# Altium PCB Flight_Computer_2_GE.PcbDoc (part 1 of 5)
Units mil, origin at the board's own origin, x right, y up, seen from the top; angles counter-clockwise.
Board outline 4000 x 3000 mil, 4 copper layers (Top Layer, GND, 3.3V, Bottom Layer), stack 62.449 mil thick; 220 components, 150 nets, 776 pads, 444 vias.
Unrouted connection lines stored in the file: 107.
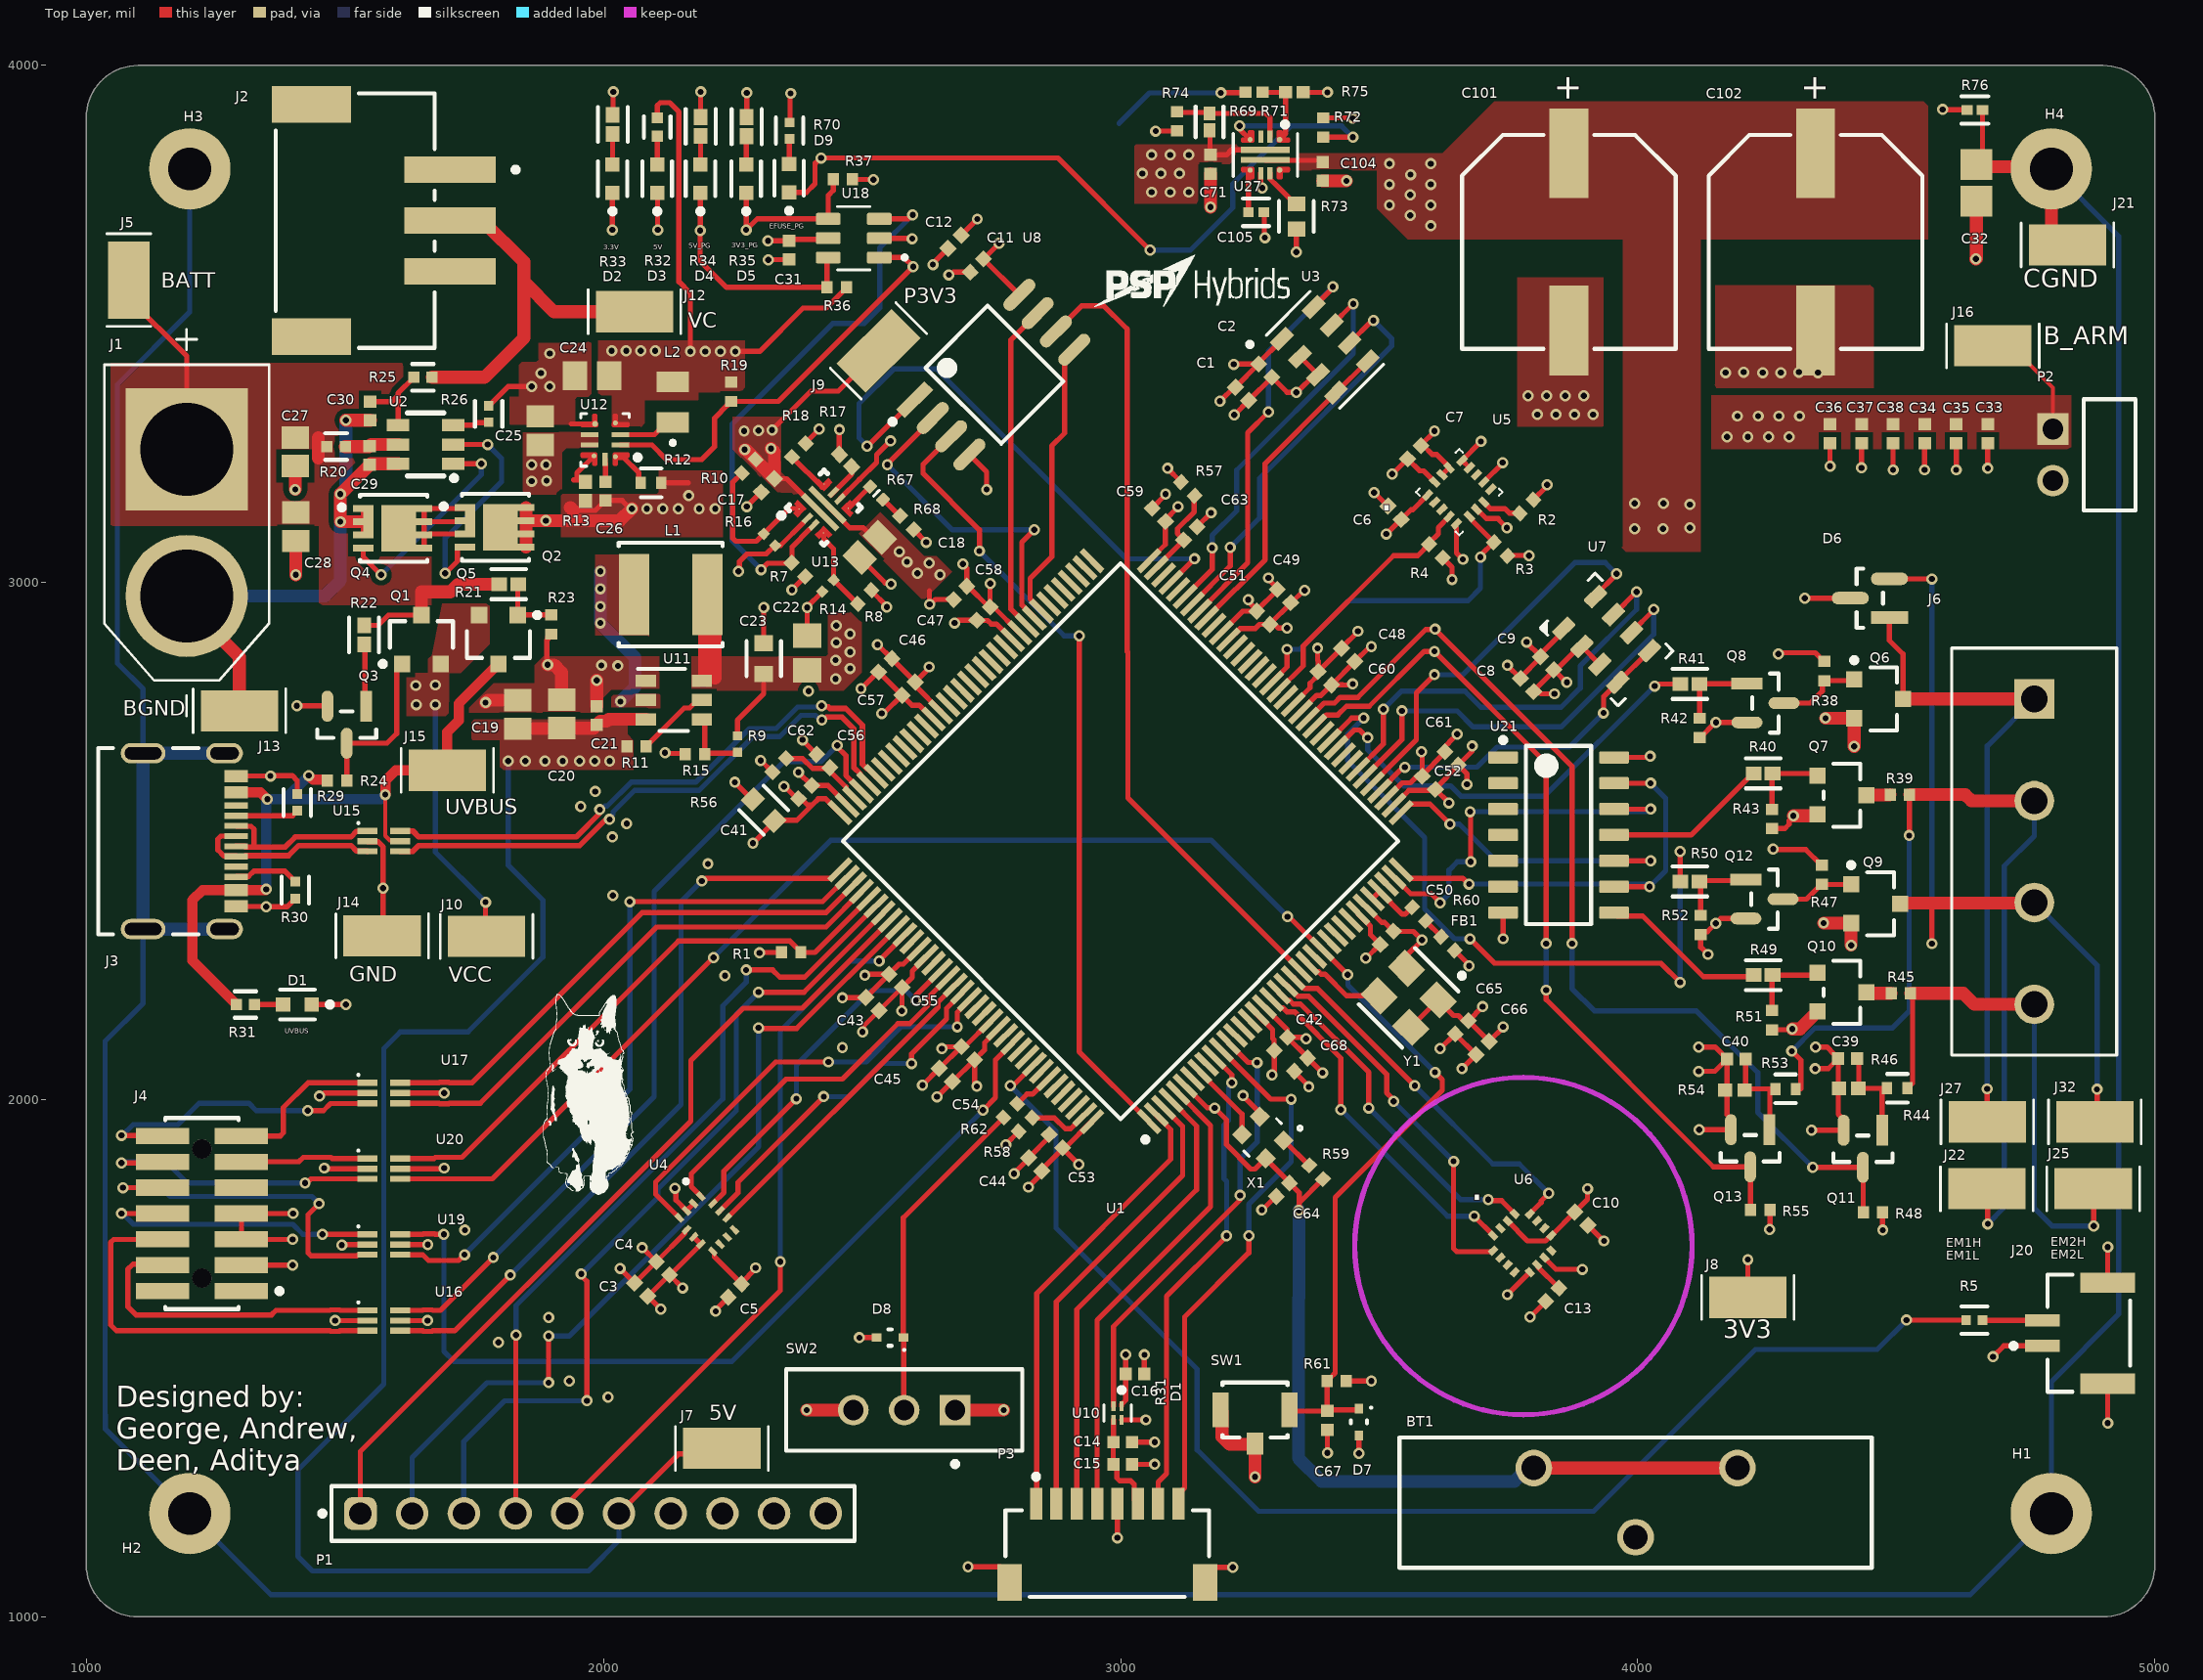
[diagram p0: Top Layer view]
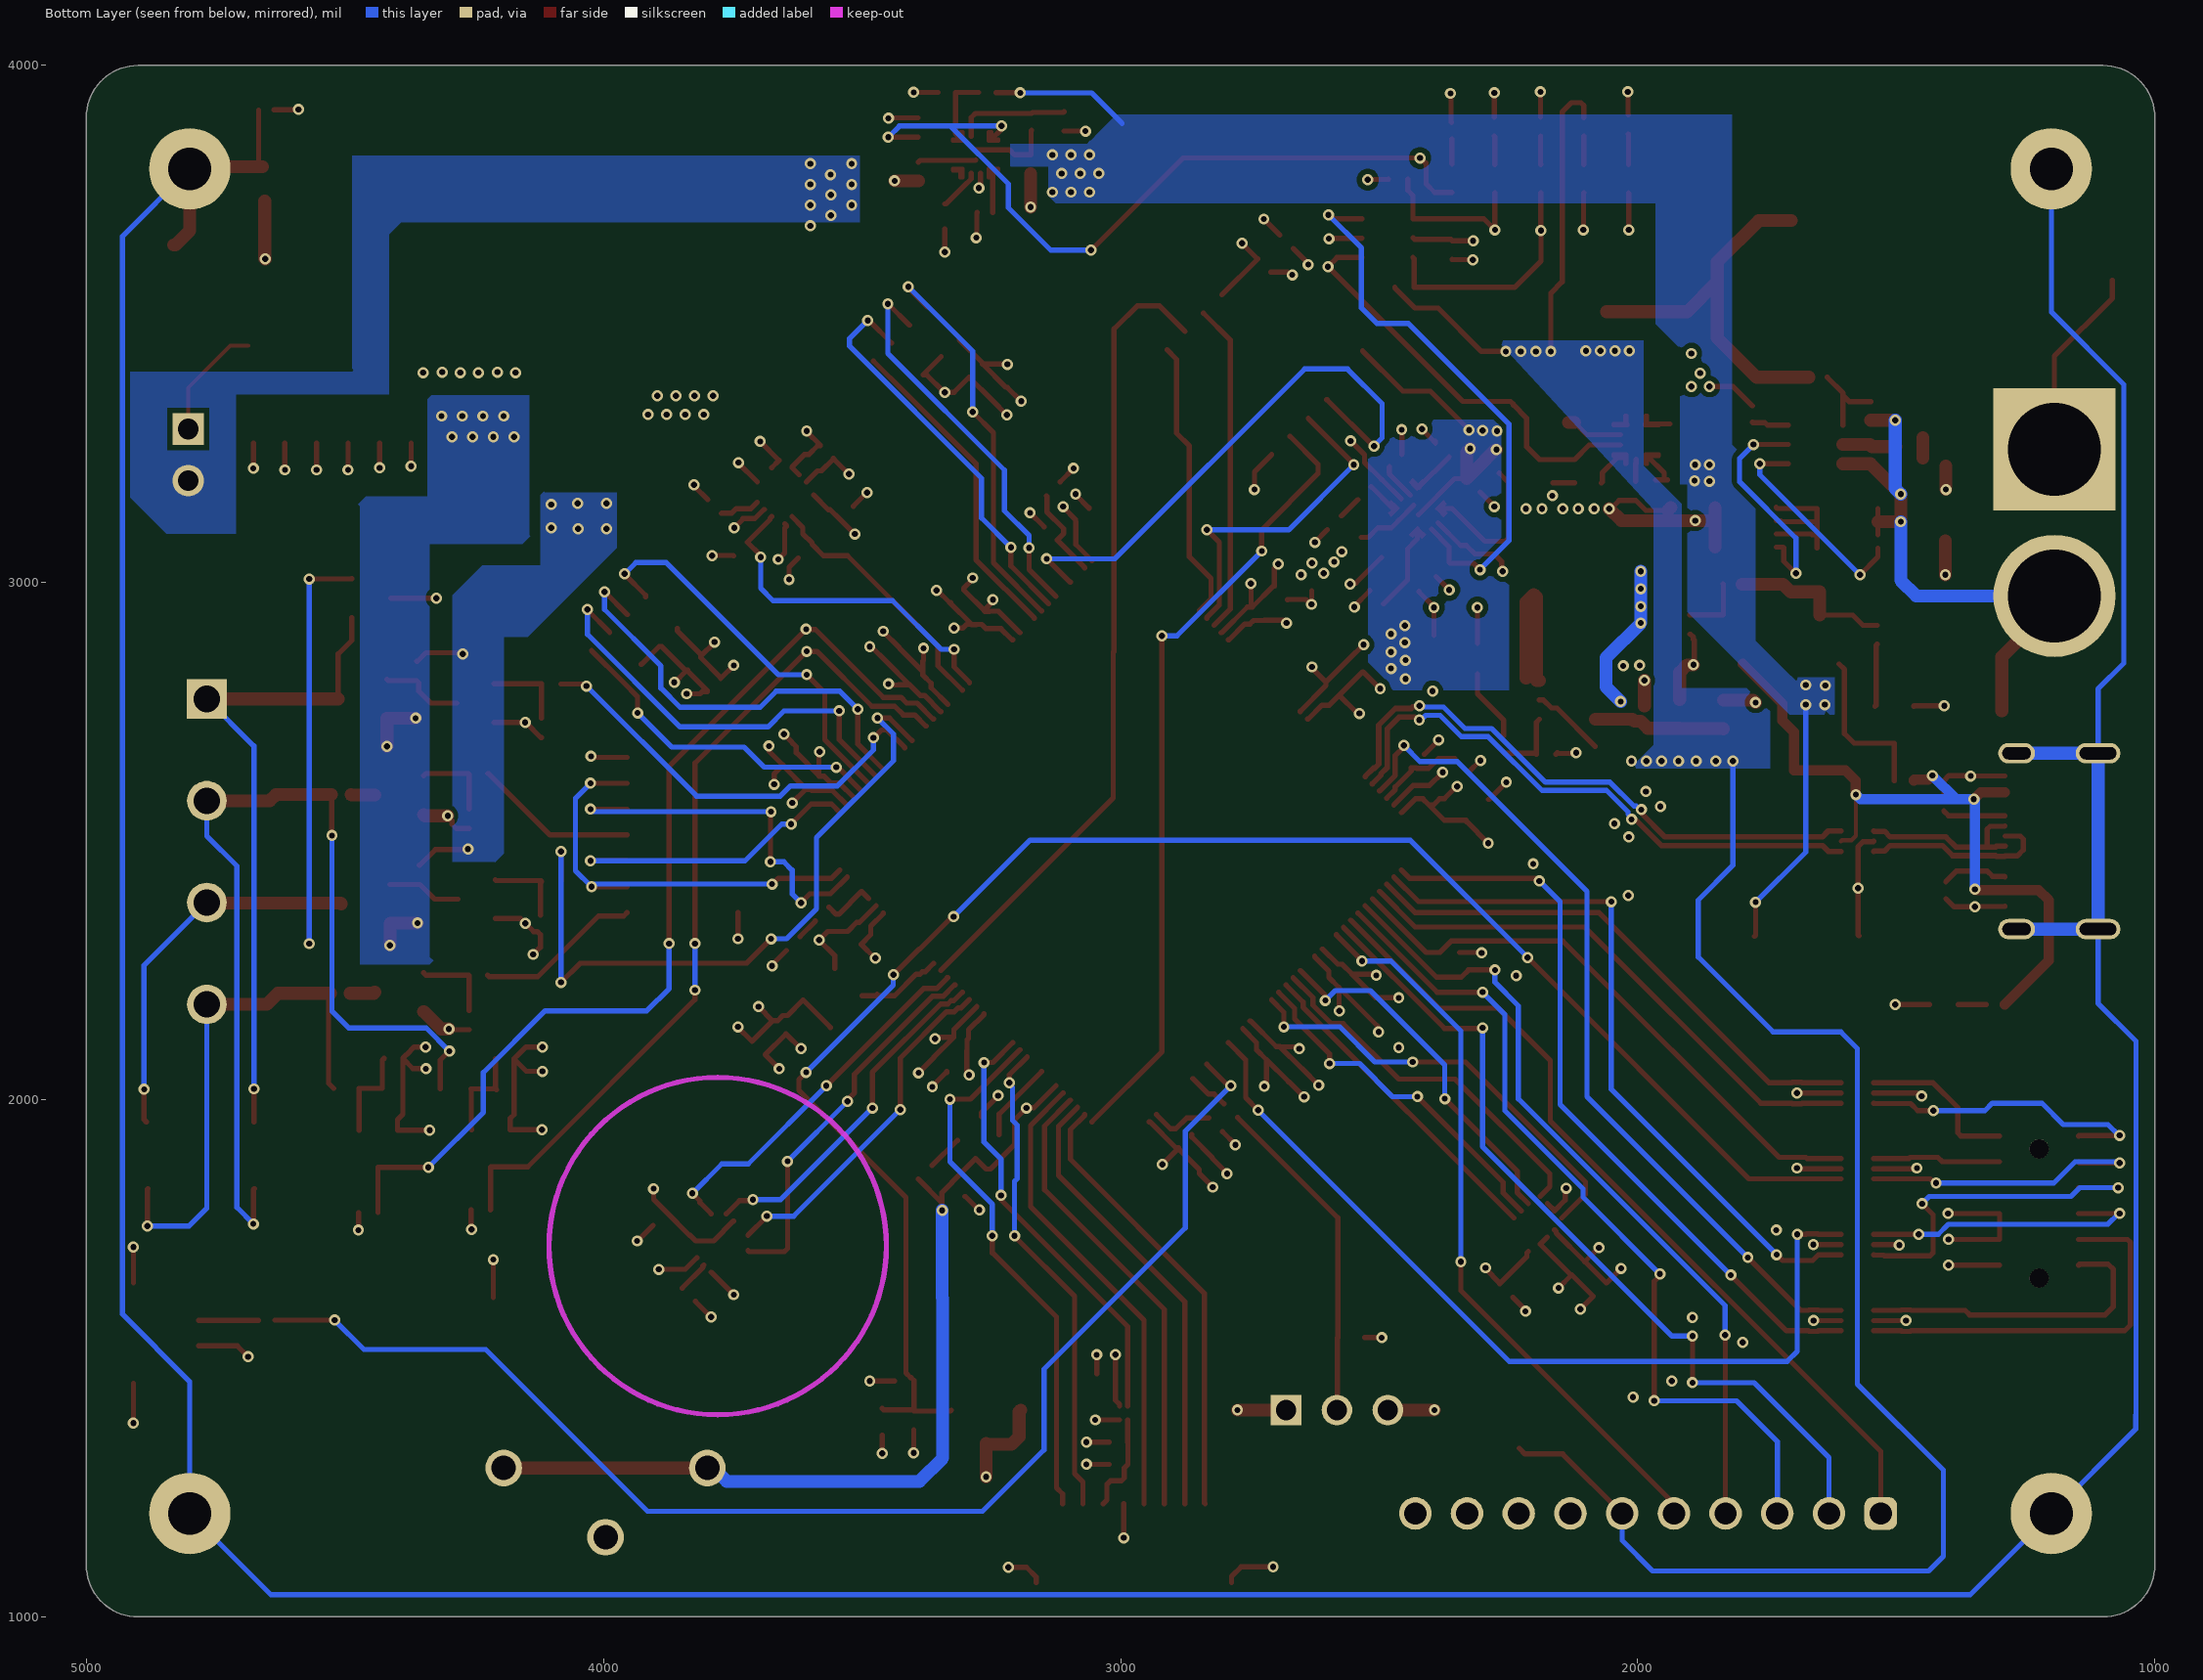
[diagram p1: Bottom Layer view, seen from below]
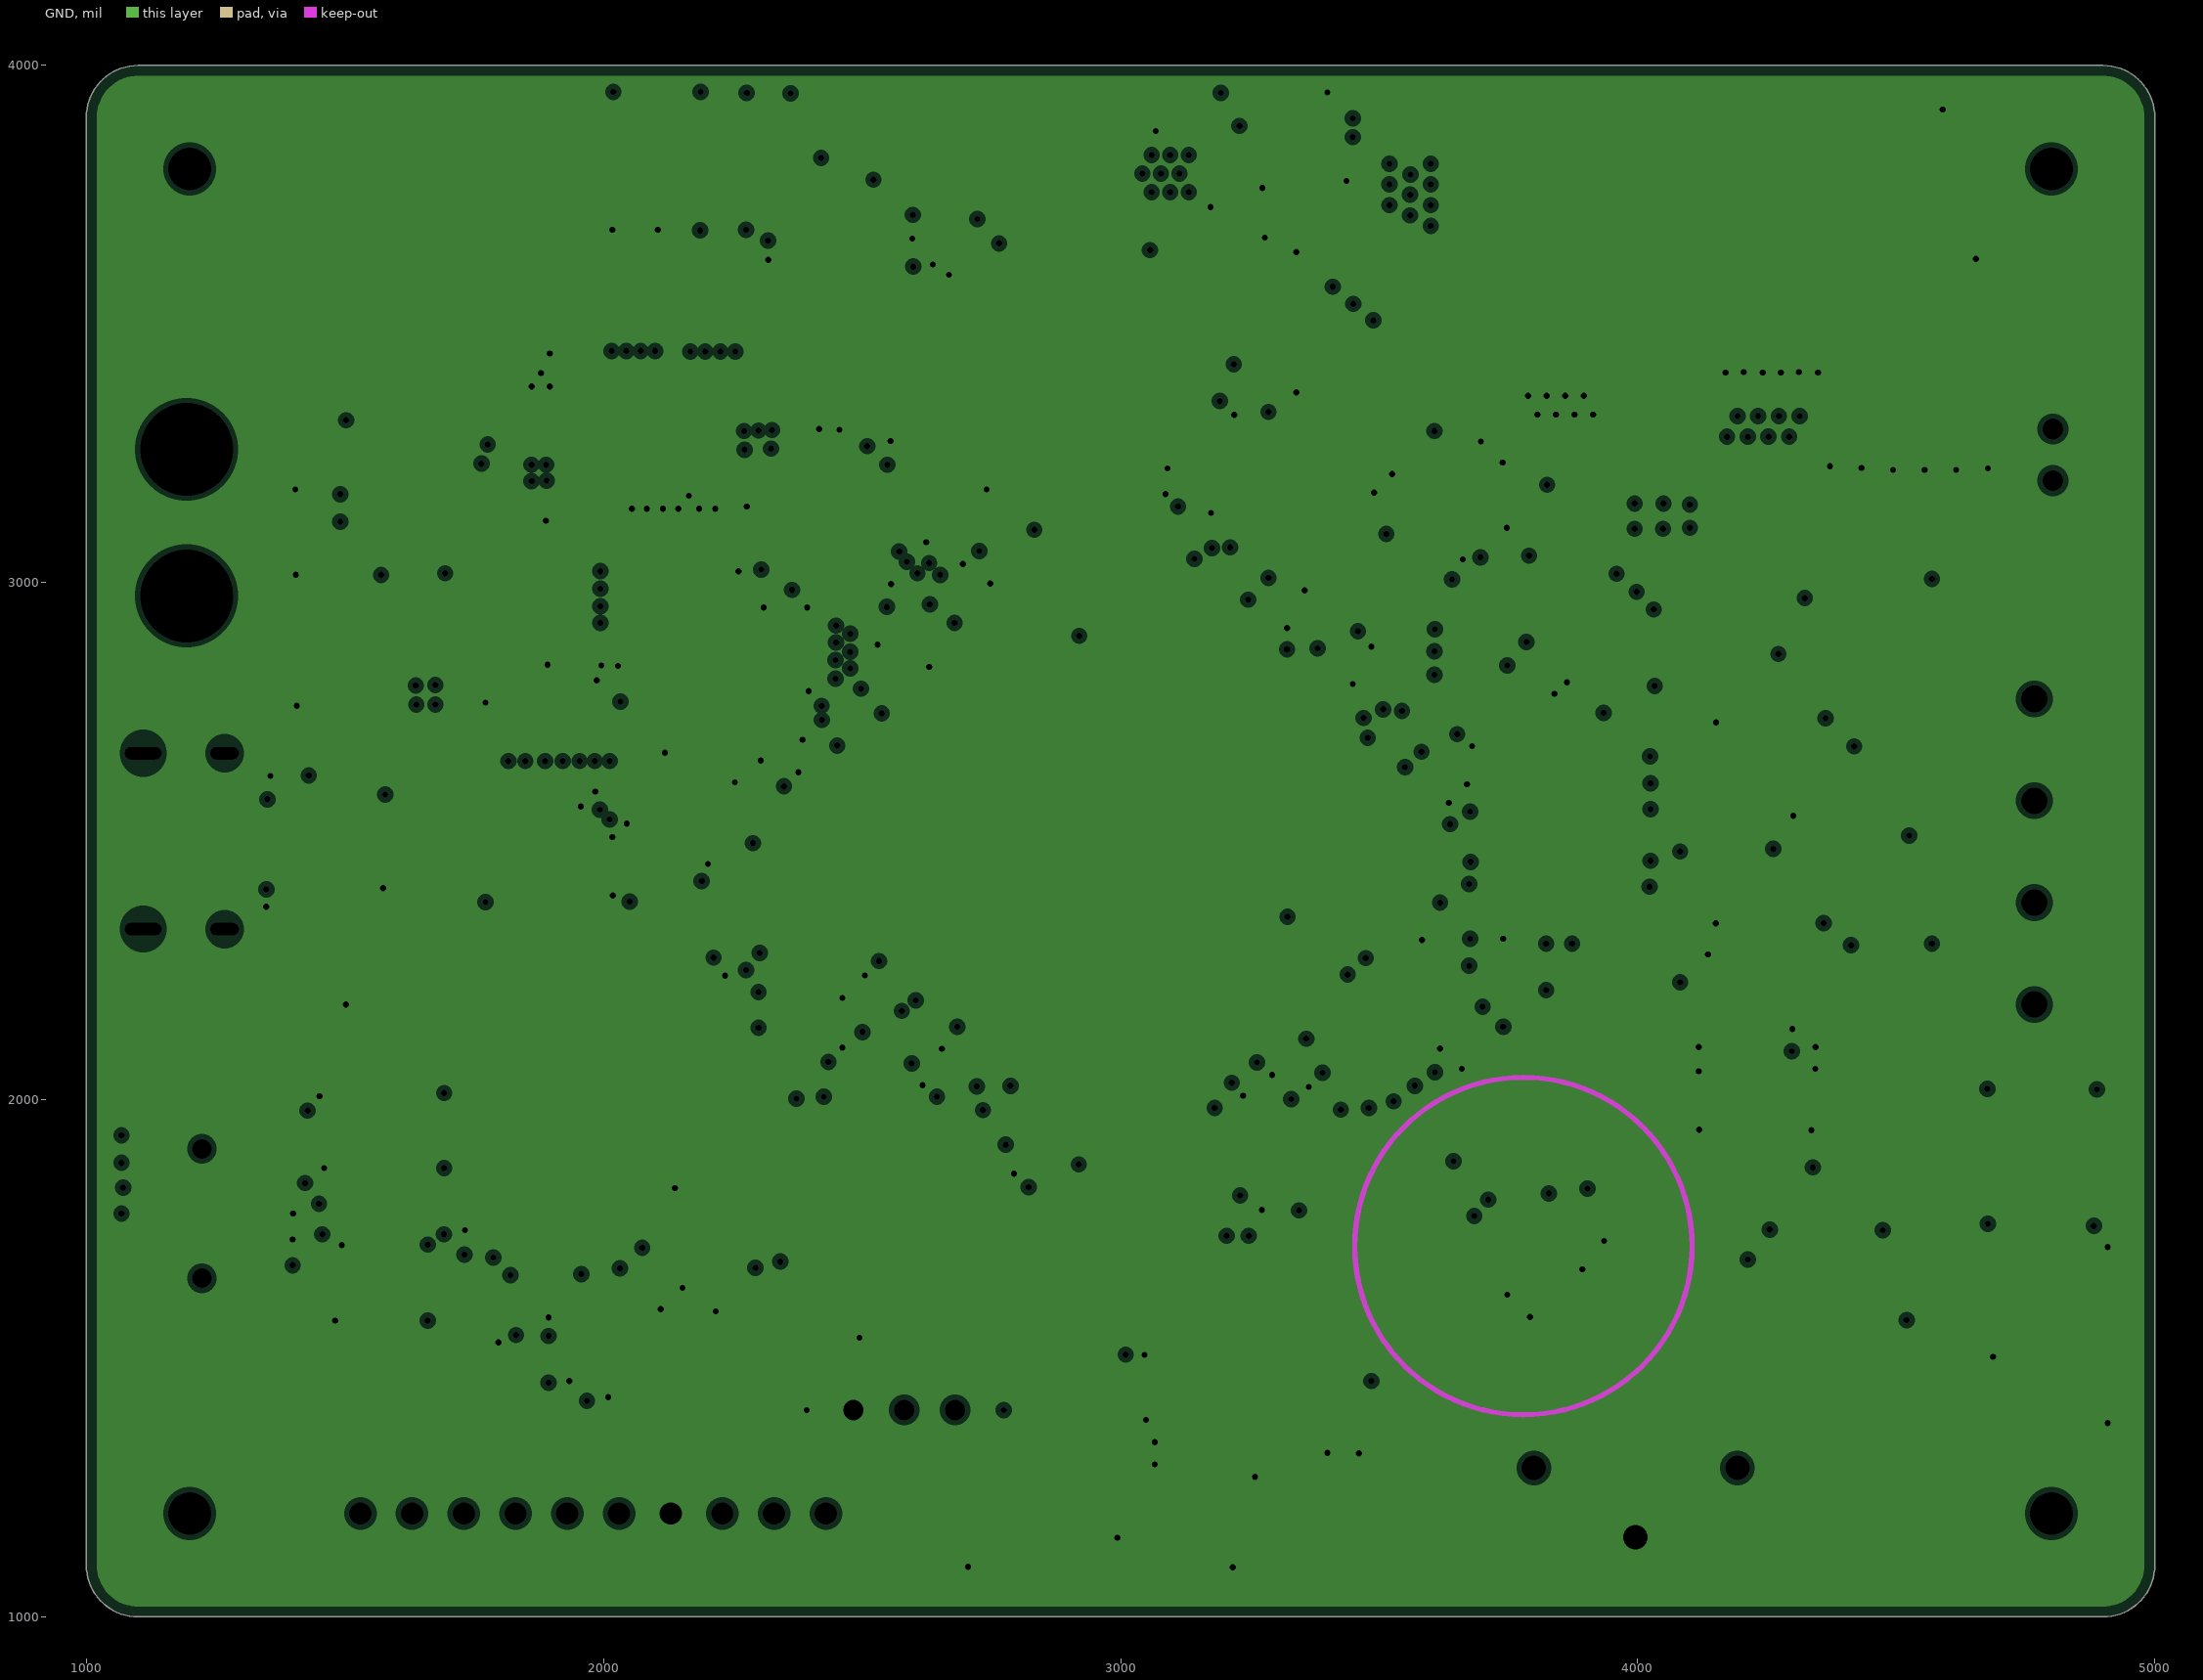
[diagram p2: GND, clearances drawn from the general rule]
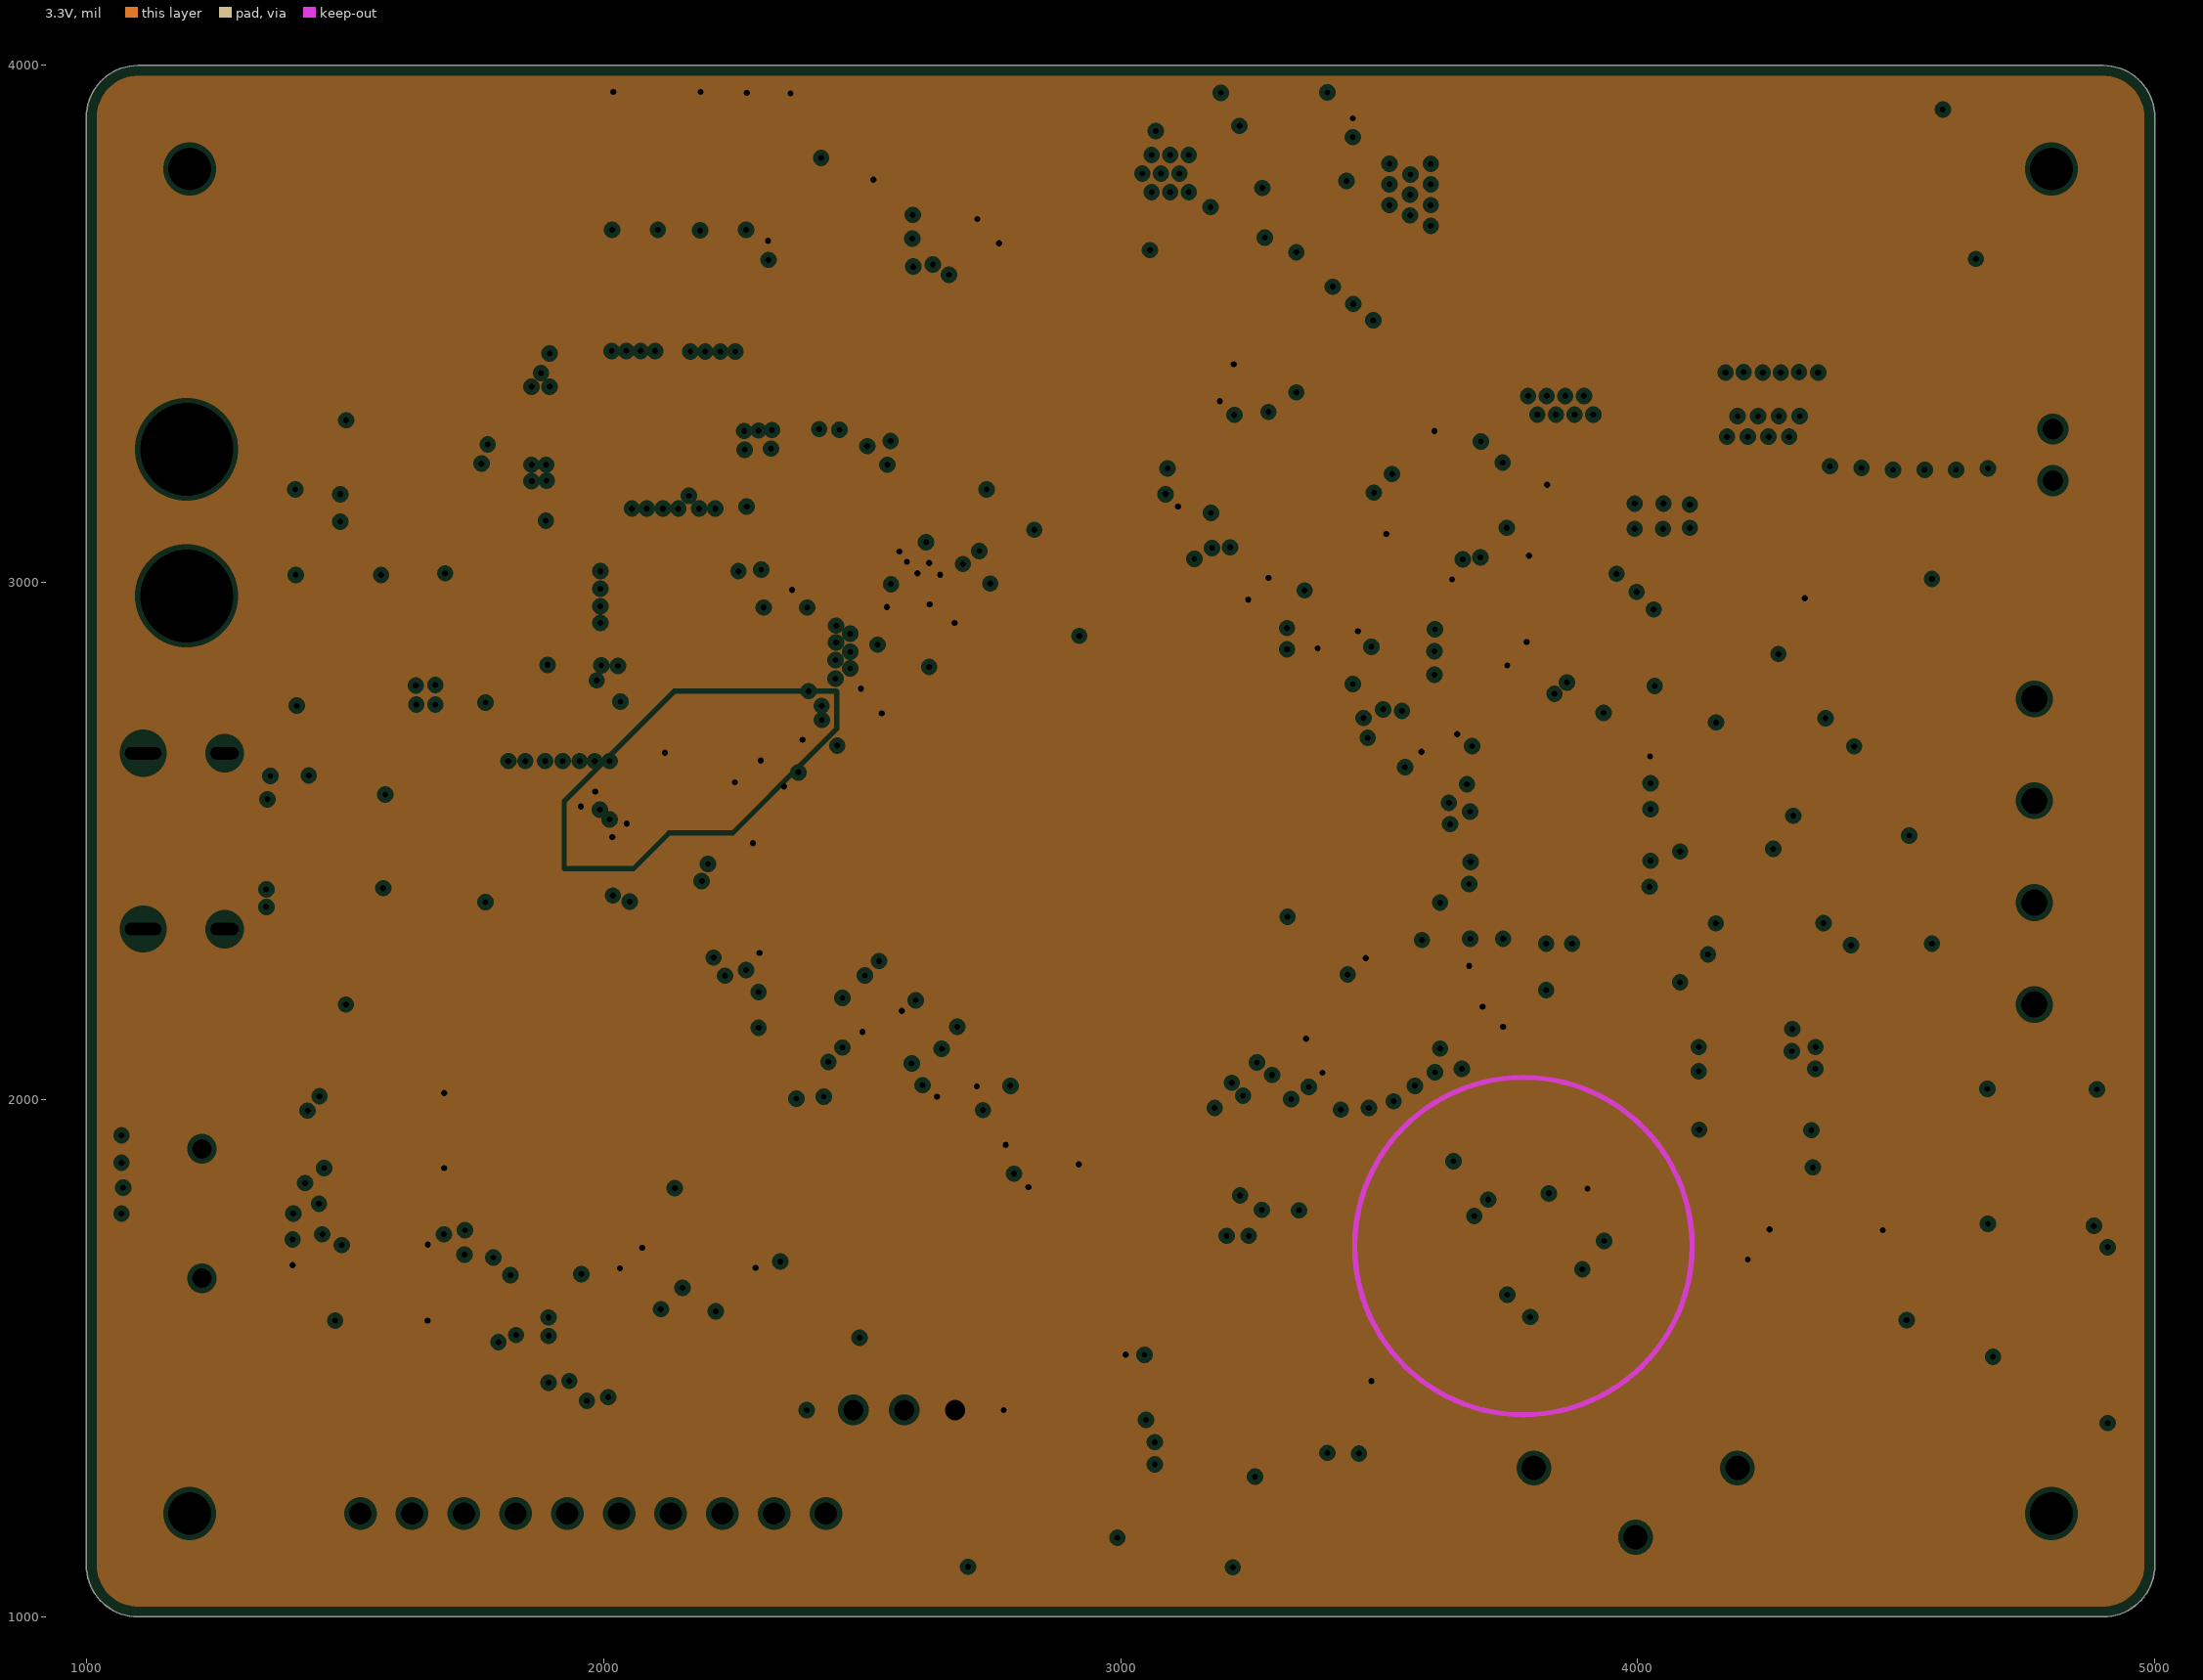
[diagram p3: 3.3V, clearances drawn from the general rule]
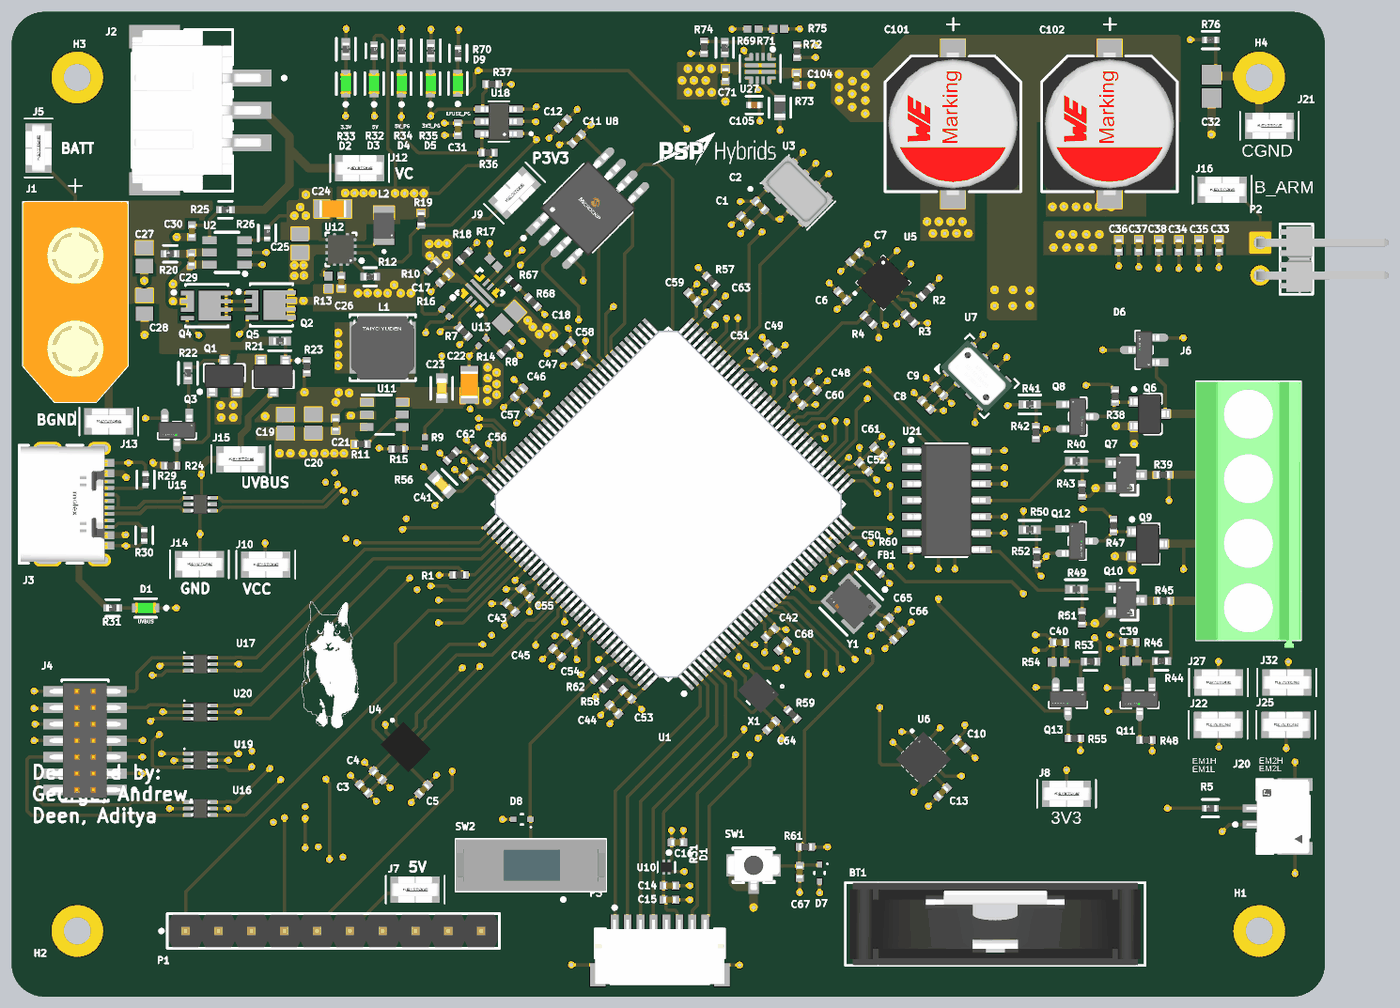
[diagram p6: 3D render of the assembled board from above, using the file's embedded part models]

## Layer stack, top to bottom
Top Solder: solder mask 0.4, Solder Resist, Dk 3.8
Top Layer: signal copper 1.378
Dielectric 2: prepreg 8.284, PP-023, Dk 4.4
GND: plane copper 0.598, net GND
Dielectric 1: dielectric 41.929, FR-4, Dk 4.6
3.3V: plane copper 0.598, net (Multiple Nets)
Dielectric 3: prepreg 8.284, PP-023, Dk 4.4
Bottom Layer: signal copper 1.378
Bottom Solder: solder mask 0.598, Solder Resist, Dk 3.8

## Board outline
1000,1100 1000,3900 cw(c1100,3900) 1100,4000 4900,4000 cw(c4900,3900) 5000,3900 5000,1100 cw(c4900,1100) 4900,1000 1100,1000 cw(c1100,1100)

## Design rules (kind name [scope] priority, off if disabled: settings)
BoardOutlineClearance [All] p1: gap=15 ignorepadtopadclearanceinfootprint=FALSE
Clearance "Clearance Polygons" [InPolygon] p1: gap=10 ignorepadtopadclearanceinfootprint=FALSE
Clearance [All] p2: gap=5 ignorepadtopadclearanceinfootprint=FALSE
ComponentClearance "HM-TRP & UFL" [InComponent('X1') vs InComponent('U1')] p1: gap=0 collisioncheckmode=3 verticalgap=0 showdistances=FALSE
ComponentClearance [All] p2: gap=1 collisioncheckmode=3 verticalgap=1 showdistances=FALSE
DiffPairsRouting USBDIFF90 [InDifferentialPairClass('DIFF90')] p1: maxlimit=6 minlimit=6 mostfreqgap=6 toplayer_minwidth=10.58 toplayer_maxwidth=10.58 toplayer_prefwidth=10.58 bottomlayer_minwidth=9.95 bottomlayer_maxwidth=9.95 bottomlayer_prefwidth=9.95 impedanceprofiledriven=TRUE impedanceprofileid={24B08B54-F0FF-471F-A850-5E2F393EB6C5} impedanceprofilevalue=90.000000 maxuncoupledlength=500
HoleSize [All] p1: absolutevalues=TRUE maxlimit=265 minlimit=10 maxpercent=80.000 minpercent=20.000
HoleToHoleClearance [All] p1: gap=10 allowstackedmicrovias=FALSE
MinimumAnnularRing [All] p1: minimumring=4
MinimumSolderMaskSliver [All] p1: minsoldermaskwidth=0
PlaneClearance [All] p1: clearance=10
PlaneConnect [All] p1: planeconnectstyle=Relief reliefexpansion=4 reliefentries=4 reliefconductorwidth=6 reliefairgap=6
PolygonConnect "Via connect style" [isVia] p1: connectstyle=Direct reliefconductorwidth=10 reliefentries=4 polygonreliefangle="90 Angle" airgapwidth=10
PolygonConnect [All] p2: connectstyle=Direct reliefconductorwidth=10 reliefentries=4 polygonreliefangle="90 Angle" airgapwidth=6
RoutingCorners [All] p1: cornerstyle=45-Degree minsetback=49.21 maxsetback=49.21
RoutingPriority [InNetClass('All Nets')] p1: routingpriority=0
RoutingVias [All] p1: holewidth=11.81 width=21.65 viastyle="Through Hole" minholewidth=11.81 minwidth=21.65 maxholewidth=11.81 maxwidth=21.65
SilkToSilkClearance [All] p1: silktosilkclearance=0
SilkToSolderMaskClearance [IsPad] p1: minsilkscreentomaskgap=5 clearancetoexposedcopper=TRUE
SolderMaskExpansion [All] p1: expansion=2.5 istentingtop=FALSE
SupplyNets "Schematic Supply Nets" [InNet('GND')] p1: voltage=0.000
SupplyNets "Schematic Supply Nets_12" [InNet('VC')] p2: voltage=0.000
SupplyNets "Schematic Supply Nets_11" [InNet('3V3_PRE')] p3: voltage=0.000
SupplyNets "Schematic Supply Nets_9" [InNet('VCC')] p4: voltage=0.000
SupplyNets "Schematic Supply Nets_8" [InNet('CHASSIS_GND')] p5: voltage=0.000
SupplyNets "Schematic Supply Nets_7" [InNet('Battery_GND')] p6: voltage=0.000
SupplyNets "Schematic Supply Nets_5" [InNet('AV_HOLD')] p7: voltage=0.000
SupplyNets "Schematic Supply Nets_6" [InNet('3V3')] p8: voltage=0.000
SupplyNets "Schematic Supply Nets_4" [InNet('VBAT')] p9: voltage=0.000
SupplyNets "Schematic Supply Nets_3" [InNet('BATT')] p10: voltage=0.000
SupplyNets "Schematic Supply Nets_2" [InNet('UVBUS')] p11: voltage=0.000
SupplyNets "Schematic Supply Nets_1" [InNet('5V')] p12: voltage=0.000
Width UVBUS [InNet('UVBUS')] p1: maxlimit=50 minlimit=7.99 preferedwidth=19.68 toplayer_minwidth=8 bottomlayer_maxwidth=19.68 minimp=50.000000 maximp=50.000000 favimp=50.000000
Width GND [InNetClass('GND')] p2: maxlimit=25 minlimit=8 preferedwidth=10 minimp=50.000000 maximp=50.000000 favimp=50.000000
Width 3V3 [InNetClass('3V3')] p3: maxlimit=25 minlimit=8 preferedwidth=10 minimp=50.000000 maximp=50.000000 favimp=50.000000
Width Power [InNetClass('Power')] p4: maxlimit=25 minlimit=8 preferedwidth=10 minimp=50.000000 maximp=50.000000 favimp=50.000000
Width Default [All] p5: maxlimit=25 minlimit=8 preferedwidth=10 minimp=50.000000 maximp=50.000000 favimp=50.000000
19 further rules are at their usual default settings.

## Classes and differential pairs
differential pair class "DIFF 90": CON_USB
component class Pyro: C33 C34 C35 C36 C37 C38 C39 C40 D6 J6 J16 J22 J25 J27 J32 P2 Q6 Q7 Q8 Q9 Q10 Q11 Q12 Q13 R38 R39 R40 R41 R42 R43 R44 R45 R46 R47 R48 R49 R50 R51 R52 R53 R54 R55 U21
component class OSC_UI: C65 C66 C67 D7 D8 R59 R61 R62 SW1 SW2 X1 Y1
component class Connectors: C31 C32 D1 D2 D3 D4 D5 H1 H2 H3 H4 J3 J4 J20 J21 R5 R29 R30 R31 R32 R33 R34 R35 R36 R37 R76 U15 U16 U17 U18 U19 U20
net class 3V3: 3V3 3V3_PG_LOW 3V3_PRE
net class GND: Battery_GND
net class Power: 3V3 3V3_PG_LOW 3V3_PRE 5V 5V_PG 5V_PG_LOW BATT BATT_ARM Battery_GND UVBUS
differential pair class DIFF90: USB_D
component class MCU: R1 U1
component class Sensors: C1 C2 C3 C4 C5 C6 C7 C8 C9 C10 C11 C12 C13 C14 C15 C16 P1 P3 R2 R3 R4 U3 U4 U5 U6 U7 U8 U10
component class Power: BT1 C17 C18 C19 C20 C21 C22 C23 C24 C25 C26 C27 C28 C29 C30 C71 C101 C102 C104 C105 D9 J1 J2 J5 J7 J8 J9 J10 J12 J13 J14 J15 L1 L2 Q1 Q2 Q3 Q4 Q5 R7 R8 R9 R10 R11 R12 R13 R14 R15 R16 R17 R18 R19 R20 R21 R22 R23 R24 R25 R26 R67 R68 R69 R70 R71 R72 R73 R74 R75 U2 U11 U12 U13 U27
component class MCU_POWER: C41 C42 C43 C44 C45 C46 C47 C48 C49 C50 C51 C52 C53 C54 C55 C56 C57 C58 C59 C60 C61 C62 C63 C64 C68 FB1 R56 R57 R58 R60
differential pair USB_D: +USB_D_P -USB_D_N
differential pair CON_USB: +CON_USB_P -CON_USB_N

## Components (designator, comment, footprint, x,y, rotation, side; value= is the part's Value field where it differs from the comment)
BT1 "79548211" 79548211 3996,1221 r180 top
C1 "10uF" 0402_C#1 3235,3365 r135 top value=10µF
C2 "100nF" 0402_C#1 3280,3410 r135 top
C3 "10uF" 0402_C#1 2073,1633 r135 top value=10µF
C4 "100nF" 0402_C#1 2115,1674 r135 top
C5 "100nF" 0402_C#1 2254.19,1631.19 r45 top
C6 "10uF" 0402_C#1 3530,3135 r315 top value=10µF
C7 "100nF" 0402_C#1 3568,3252 r45 top
C8 "10uF" 0402_C#1 3786,2802 r135 top value=10µF
C9 "100nF" 0402_C#1 3824.81,2844.19 r135 top
C10 "CL05A105KL5NRNC" 0402_C#2 3891,1770 r135 top value=1µF
C11 "100nF" 0402_C#1 2722,3613 r45 top
C12 "10uF" 0402_C#1 2679,3659 r45 top value=10µF
C13 "10uF" 0402_C#1 3835,1623 r45 top value=10µF
C14 "100nF" 0402_C#1 3004,1338 r180 top
C15 "100nF" 0402_C#1 3004,1295 r180 top
C16 "CL05A105KL5NRNC" 0402_C#2 3028,1470 r0 top value=1µF
C17 "100nF" 0402_C#1 2318,3188 r225 top
C18 "C0805C106K8RACTU" CAPC2013X145X50LL20T25 2515,3068 r45 top
C19 "C0805C106K8RACTU" CAPC2013X145X50LL20T25 1834,2745 r270 top
C20 "C0805C106K8RACTU" CAPC2013X145X50LL20T25 1919,2746 r270 top
C21 "100nF" 0402_C#1 1987,2743 r90 top
C22 "C0805C226K8PAC" CAPC2013X135X45NL10T25 2394,2864 r270 top value=1µF
C23 "CC0603MRX5R8BB475" FP-CC0603-DA-MFG 2310,2853 r90 top value="4.7 uF"
C24 "C0805C226K8PAC" CAPC2013X135X45NL10T25 1978,3400 r0 top value=1µF
C25 "C0805C106K8RACTU" CAPC2013X145X50LL20T25 1878,3294 r270 top
C26 "3.3nF" 0402_C#1 2004,3177 r90 top
C27 "C0805C106K8RACTU" CAPC2013X145X50LL20T25 1404,3253 r90 top
C28 "C0805C106K8RACTU" CAPC2013X145X50LL20T25 1405,3108 r90 top
C29 "100nF" 0402_C#1 1548,3245.89 r90 top
C30 "100nF" 0402_C#1 1549,3332 r90 top
C31 "100nF" 0402_C#1 2359,3643 r270 top
C32 "C0805C102JDRACTU" CAPC2013X145X50ML20T25 4655,3773 r270 top
C33 "C0402C105K4PAC" 0402_C#2 4677,3288 r90 top value=1µF
C34 "100nF" 0402_C#1 4555,3288 r90 top
C35 "100nF" 0402_C#1 4616,3288 r90 top
C36 "CL05A105KL5NRNC" 0402_C#2 4372,3288 r90 top value=1µF
C37 "100nF" 0402_C#1 4433,3288 r90 top
C38 "100nF" 0402_C#1 4494,3288 r90 top
C39 "100nF" 0402_C#1 4406,2080 r180 top
C40 "100nF" 0402_C#1 4190.89,2079 r180 top
C41 "C0603C475K8PAC" FP-CC0603-DA-MFG 2310,2560 r135 top value="4.7 uF"
C42 "100nF" 0402_C#1 3310,2108 r225 top
C43 "100nF" 0402_C#1 2520,2185 r135 top
C44 "100nF" 0402_C#1 2835,1875 r135 top
C45 "100nF" 0402_C#1 2662.19,2047.81 r135 top
C46 "100nF" 0402_C#1 2545,2840 r45 top
C47 "100nF" 0402_C#1 2690,2980 r45 top
C48 "100nF" 0402_C#1 3440,2860 r315 top
C49 "100nF" 0402_C#1 3316,2974 r315 top
C50 "100nF" 0402_C#1 3515,2313 r45 top
C51 "100nF" 0402_C#1 3276,2932 r315 top
C52 "100uF" 0402_C#1 3596,2613 r315 top value=4.7uF
C53 "100nF" 0402_C#1 2875,1920 r135 top
C54 "100nF" 0402_C#1 2705,2090 r135 top
C55 "100nF" 0402_C#1 2565,2230 r135 top
C56 "100nF" 0402_C#1 2390,2595 r45 top
C57 "100nF" 0402_C#1 2590,2795 r45 top
C58 "100nF" 0402_C#1 2735,2940 r45 top
C59 "100nF" 0402_C#1 3074,3131 r135 top
C60 "100nF" 0402_C#1 3395,2815 r315 top
C61 "100nF" 0402_C#1 3640,2660 r315 top
C62 "2.2uF" 0402_C#1 2425,2655 r315 top value=2.2µF
C63 "2.2uF" 0402_C#1 3135,3095 r225 top value=2.2µF
C64 "100nF" 0402_C#1 3314,1826 r225 top
C65 "100nF" 0402_C#1 3660,2140 r45 top
C66 "100nF" 0402_C#1 3700,2100 r45 top
C67 "100nF" 0402_C#1 3400,1380 r270 top
C68 "CL05A105KL5NRNC" 0402_C#2 3349,2068 r225 top value=1µF
C71 "CL05A105KL5NRNC" 0402_C#2 3174,3809 r270 top value=1µF
C101 "470uF" WCAP-AS5H_D10H10.5 3867,3658.74 r90 top
C102 "470uF" WCAP-AS5H_D10H10.5 4344,3658.74 r90 top
C104 "CL05A105KL5NRNC" 0402_C#2 3391,3795 r270 top value=1µF
C105 "10nF" FP-CL386-IPC_C 3262,3716 r0 top
D1 "LSM0603453V" FP-LSM0603453V-MFG 1408,2184.15 r180 top
D2 "LSM0603453V" FP-LSM0603453V-MFG 2017.56,3781 r90 top
D3 "LSM0603453V" FP-LSM0603453V-MFG 2104,3781 r90 top
D4 "LSM0603453V" FP-LSM0603453V-MFG 2187.56,3781 r90 top
D5 "LSM0603453V" FP-LSM0603453V-MFG 2276,3781 r90 top
D6 "BAT54ALT1G" FP-318-08-IPC_A 4449,2970 r180 top
D7 "ESD5Z3.3T1G" ONSC-SOD-523-2-502-01_V 3461,1377 r270 top
D8 "ESD5Z3.3T1G" ONSC-SOD-523-2-502-01_V 2554.02,1540 r180 top
D9 "LSM0603453V" FP-LSM0603453V-MFG 2359,3782 r90 top
FB1 "FB0402" 0402_R 3633,2302 r135 top
H1 "M2" "Mounting Hole"#1 4805,1180 r0 top
H2 "M2" "Mounting Hole"#2 1200,1200 r0 top locked
H3 "M2" "Mounting Hole"#3 1260,3775 r0 top
H4 "M2" "Mounting Hole"#4 4865,3830 r0 top
J1 "XT60-M" AMASS_XT60-M 1194,3116 r270 top
J2 "S3B-XH-SM4-TB(LF)(SN)" FP-S3B-XH-SM4-TB_LF_SN-MFG 1520,3700 r270 top
J3 "2171790001" FP-2171790001-MFG 1155,2500 r270 top locked
J4 "M50-3610742" FP-M50-3610742-MFG 1223.62,1780 r90 top
J5 "5019" 5019_MFG 1082,3585 r90 top
J6 "1729034" 1729034 4767,2775 r270 top locked
J7 "5019" 5019_MFG 2229,1326 r0 top
J8 "5019" 5019_MFG 4213,1618 r0 top
J9 "5019" 5019_MFG 2532,3448 r45 top
J10 "5019" 5019_MFG 1774,2316 r0 top
J12 "5019" 5019_MFG 2060,3524 r0 top
J13 "5019" 5019_MFG 1296,2752 r0 top
J14 "5019" 5019_MFG 1572,2317 r0 top
J15 "5019" 5019_MFG 1698,2637 r0 top
J16 "5019" 5019_MFG 4687,3458 r0 top
J20 "SM02B-GHS-TB(LF)(SN)" FP-SM02B-GHS-TB_LF_SN-MFG 4872.57,1548.61 r90 top
J21 "5019" 5019_MFG 4831,3653 r0 top
J22 "5019" 5019_MFG 4675,1828 r0 top
J25 "5019" 5019_MFG 4881,1828 r0 top
J27 "5019" 5019_MFG 4676,1957 r0 top
J32 "5019" 5019_MFG 4884,1957 r0 top
L1 "NRS5040T2R2NMGJV" FP-NR5040-H_4_1-MFG 2130,2977 r0 top
L2 "1uH" AOTAB201610S3R3101T 2134,3349 r90 top value=2.2µH
P1 "61301011121" 61301011121 1980,1200 r0 top locked
P2 "TSW-102-08-F-S-NA" SMTC-TSW-102-08-X-S-NA 4803,3297 r270 top
P3 "SM08B-SRSS-TB(LF)(SN)" JST-SM08B-SRSS-TB_V 2974.32,1122.54 r0 top
Q1 "AO3401A" AO-SOT-23-3L_V 1648,2890 r90 top
Q2 "AO3401A" AO-SOT-23-3L_V 1797,2890 r270 top
Q3 "BSS138" FP-318-08-IPC_B 1503.6,2725.17 r270 top
Q4 "BSZ0902NS" INF-PG-TSDSON-8_FL_V 1594.35,3105 r270 top
Q5 "BSZ0902NS" INF-PG-TSDSON-8_FL_V 1791.35,3107 r270 top
Q6 "AO3401A" AO-SOT-23-3L_V 4466,2775.22 r0 top
Q7 "AO3400A" FP-SOT23-MFG 4395,2589 r0 top
Q8 "BSS138" FP-318-08-IPC_B 4247.17,2767 r0 top
Q9 "AO3401A" AO-SOT-23-3L_V 4460,2379 r0 top
Q10 "AO3400A" FP-SOT23-MFG 4395,2208 r0 top
Q11 "BSS138" FP-318-08-IPC_B 4435.6,1905.17 r270 top
Q12 "BSS138" FP-318-08-IPC_B 4245.17,2387.91 r0 top
Q13 "BSS138" FP-318-08-IPC_B 4217.6,1906.17 r270 top
R1 "10k" 0402_R 2363,2285 r0 top value=10kΩ
R2 "10k" 0402_R 3785,3147 r45 top value=10kΩ
R3 "4K7" 0402_R 3735,3065 r315 top value=4.7kΩ
R4 "4K7" 0402_R 3610,3061 r315 top value=4.7kΩ
R5 "1k" FP-MCS0402-IPC_C 4651,1574 r180 top
R7 "10k" 0402_R 2377,3025 r135 top value=10kΩ
R8 "10k" 0402_R 2505,2972 r225 top value=10kΩ
R9 "CPF0402B33K2E1" RESC1005X35X20LL05T10 2259,2688 r90 top
R10 "10k" 0402_R 2281,3225 r225 top value=10kΩ
R11 "10k" 0402_R 2064,2683 r180 top value=10kΩ
R12 "76.8k" FP-RT0402-MFG 2092,3193 r0 top value=76.8KΩ
R13 "40.2k" RESC1005X40X25ML05T10 1965,3176.3 r90 top
R14 "CPF0402B33K2E1" RESC1005X35X20LL05T10 2434,2994 r45 top
R15 "10k" 0402_R 2177,2668 r180 top value=10kΩ
R16 "CPF0402B33K2E1" RESC1005X35X20LL05T10 2321,3083 r135 top
R17 "CR0402-JW-152GLF" RESC1005X40X25NL10T10 2468.17,3235.83 r315 top
R18 "0R" 0402_R 2378,3256 r225 top value=0Ω
R19 "10k" 0402_R 2247,3369 r270 top value=10kΩ
R20 "330" FP-MCS0402-MFG 1483,3263 r180 top
R21 "165" FP-RMCF0402-IPC_A 1816.67,2997 r0 top
R22 "165" FP-RMCF0402-IPC_A 1537,2899 r270 top
R23 "10k" 0402_R 1899,2919 r90 top value=10kΩ
R24 "10k" 0402_R 1485,2617 r0 top value=10kΩ
R25 "330" FP-MCS0402-MFG 1651,3397 r0 top
R26 "2k" FP-MCS0402-IPC_C 1778,3326 r90 top
R29 "5.1k" FP-RN73R1E-IPC_C 1408,2575 r90 top
R30 "5.1k" FP-RN73R1E-IPC_C 1404,2405.3 r270 top
R31 "330" FP-MCS0402-MFG 1307.72,2184.15 r180 top
R32 "330" FP-MCS0402-MFG 2104,3881 r90 top
R33 "165" FP-RMCF0402-IPC_A 2018,3886 r90 top
R34 "165" FP-RMCF0402-IPC_A 2188,3882 r90 top
R35 "165" FP-RMCF0402-IPC_A 2277,3881.67 r90 top
R36 "10k" 0402_R 2451,3571 r180 top value=10kΩ
R37 "10k" 0402_R 2463,3780 r180 top value=10kΩ
R38 "10k" 0402_R 4361,2829 r270 top value=10kΩ
R39 "0R" 0402_R 4507,2590 r0 top value=0Ω
R40 "165" FP-RMCF0402-IPC_A 4242.67,2631 r0 top
R41 "165" FP-RMCF0402-IPC_A 4101,2804 r0 top
R42 "10k" 0402_R 4120,2719 r90 top value=10kΩ
R43 "10k" 0402_R 4260,2543 r90 top value=10kΩ
R44 "76.8k" FP-RT0402-MFG 4502,2022 r180 top value=76.8KΩ
R45 "0R" 0402_R 4509,2206 r0 top value=0Ω
R46 "40.2k" RESC1005X40X25ML05T10 4408,2022 r0 top
R47 "10k" 0402_R 4356,2435 r270 top value=10kΩ
R48 "10k" 0402_R 4455,1782 r0 top value=10kΩ
R49 "165" FP-RMCF0402-IPC_A 4242.67,2241 r0 top
R50 "165" FP-RMCF0402-IPC_A 4101,2422 r0 top
R51 "10k" 0402_R 4260,2154 r90 top value=10kΩ
R52 "10k" 0402_R 4122,2338 r90 top value=10kΩ
R53 "76.8k" FP-RT0402-MFG 4286,2021 r180 top value=76.8KΩ
R54 "40.2k" RESC1005X40X25ML05T10 4188,2019 r0 top
R55 "10k" 0402_R 4237.3,1787 r0 top value=10kΩ
R56 "0R" 0402_R 2340,2647 r45 top value=0Ω
R57 "0R" 0402_R 3130,3181 r315 top value=0Ω
R58 "0R" 0402_R 2816,1952 r225 top value=0Ω
R59 "10k" 0402_R 3378,1860 r135 top value=10kΩ
R60 "0R" 0402_R 3577,2359 r315 top value=0Ω
R61 "10k" 0402_R 3418,1456 r180 top value=10kΩ
R62 "10k" 0402_R 2787,1979 r225 top value=10kΩ
R67 "100R2F" RESC0402(1005)_L 2528,3173 r315 top value=100
R68 "0R" 0402_R 2587,3116 r135 top value=0Ω
R69 "69.8k" FP-RMCF0402-IPC_B 3172,3891 r90 top
R70 "1k" FP-MCS0402-IPC_C 2360,3874 r90 top
R71 "499k" RESC1005X40X25NL05T10 3258,3948 r180 top
R72 "10k" 0402_R 3392,3880 r270 top value=10kΩ
R73 "1.33k" FP-CRCW0603-e3-IPC_C 3340,3708 r270 top
R74 "10k" 0402_R 3109,3892 r270 top value=10kΩ
R75 "200k" RESC1005X40X25NL10T10 3336,3948 r180 top
R76 "1M" FP-CRGCQ0402-IPC_C 4652,3914 r180 top value=1MΩ
SW1 "B3U-1100PM" FP-B3U-1100PM-MFG 3260,1400 r0 top
SW2 "EG1218" ESWI-EG1218_V 2581.57,1400 r180 top
U1 "STM32F765ZIT7" QFP50P2200X2200X160-144N 3000,2500 r135 top locked
U2 "HY2120-CB" SOT-23-6_L2.9-W1.6-P0.95-LS2.8-BR 1656,3267 r0 top
U3 "MS560702BA03-50" MS5607-02BA03 3395,3450 r45 top
U4 "ASM330LHHTR" LSM6DS3USTR 2200,1760 r315 top
U5 "H3LIS100DLTR" H3LIS100DLTR 3655,3175 r45 top
U6 "MMC5983MA" MMC5983MA_MEM 3777,1723 r315 top
U7 "MS561101BA03-50" TECO-MS561101BA03_V 3940,2890 r45 top
U8 "SST26VF064BEUI-104I/SM" FP-C04-056-IPC_A 2756,3402 r45 top
U10 "TPS22991BNRAAR" TPS22991BNRAAR-Footprint-1 2994.13,1394.29 r270 top
U11 "TPS564201DDCR" DDC0006A_N 2136,2773 r0 top
U12 "TPS62993QRYTRQ1" RYT0009A-MFG 2003,3276 r180 top
U13 "TPS25210ARPWR" VQFN-10_L2.0-W2.0-P0.45-TL 2425.9,3143.1 r45 top
U15 "USBLC6-2P6" USBLC62P6 1575,2500 r270 top
U16 "USBLC6-2P6" USBLC62P6 1575,1573 r270 top
U17 "USBLC6-2P6" USBLC62P6 1575,2013 r270 top
U18 "SN74LVC2G06DBVRE4" SOT95P280X145-6N 2484,3666 r180 top
U19 "USBLC6-2P6" USBLC62P6 1575,1720 r270 top
U20 "USBLC6-2P6" USBLC62P6 1575,1866.68 r270 top
U21 "SN74LVC08ADR" D0014A_N 3847,2512 r0 top
U27 "TPS259470ARPWR" RPW0010A-MFG 3280,3827.16 r270 top
X1 "DSA6101JL2B-032K768VAO" VLGA4_AUA_MCH 3275,1927 r225 top
Y1 "SIT8008BI-22-33E-8.000000G" FP-SiT8008-2-MFG 3557,2197 r135 top

## Footprints (in the part's own frame and the unit in brackets; to place one, negate y for a bottom-side part, rotate by r counter-clockwise, add the part's x,y. Pads: shape width x height; smd on the part's side, far side on the other; paste and mask are expansions set on the pad)
0402_C#1 [mm]
  rect 0.6x0.62 smd: 1(-0.46,0) 2(0.46,0)
  Top Layer region: -1.397,0.254 -1.397,0.254 -1.397,0.254 -1.397,0.254
  body extent -0.5,-0.25 0.5,0.25, height 0.55
0402_C#2 [mm]
  rect 0.6x0.62 smd: 1(-0.46,0) 2(0.46,0)
  body extent -0.5,-0.25 0.5,0.25, height 0.55
0402_R [mm]
  rect 0.55x0.6 smd: 1(-0.475,0) 2(0.475,0)
  body extent -0.5,-0.25 0.5,0.25, height 0.4
5019_MFG [mm] "Recommended Land Pattern"
  rect 3.8x2.03 smd paste+0 mask+0: 1(0,0)
  silkscreen extent -2.27,-1.08 2.27,1.08, body extent -1.91,-1.01 1.91,1.01, height 2.42
1729034 [mm]
  rect 1.95x1.95 hole 1.3: 1(0,0)
  round 1.95 hole 1.3: 2(5,0) 3(10,0) 4(15,0)
  silkscreen extent -2.5,-4.05 17.5,4.05, body extent -2.49,-4.08 18.08,4.07, height 10.51
79548211 [mm] "Battery Holder"
  round 1.8 hole 1.2: 1(-5,-1.7) 1(5,-1.7) 2(0,1.7)
  silkscreen extent -11.6,-3.2 11.6,3.2, body extent -11.25,-3.2 11.25,3.2, height 18.15
61301011121 [mm] "Pin Header, pitch 2.54 mm, THT, Vertical, single row, 10p"
  rrect50% 1.6x1.6 hole 1.1: 1(-11.43,0)
  round 1.6 hole 1.1: 2(-8.89,0) 3(-6.35,0) 4(-3.81,0) 5(-1.27,0) 6(1.27,0) 7(3.81,0) 8(6.35,0) 9(8.89,0) 10(11.43,0)
  silkscreen extent -13.42,-1.35 12.85,1.35, body extent -12.7,-1.27 12.7,1.27, height 8.57
AMASS_XT60-M [mm]
  round 6 hole 4.55: N(3.6,0)
  rect 6x6 / inner round 6 / far side rect 6x6 hole 4.55: P(-3.6,0)
  silkscreen extent -9.5,-4.05 9.5,4.05, body extent -7.75,-4.05 7.75,4.05, height 16
AO-SOT-23-3L_V [mm] "SOT23, 3-Leads, Body 3.1x1.8mm, Pitch 0.95mm"
  rect 0.8x0.8 smd: 1(-1.2,0.95) 2(-1.2,-0.95) 3(1.2,0)
  silkscreen extent -1.32,-1.55 0.9,2.02, body extent -1.5,-1.55 1.5,1.55, height 1.25
AOTAB201610S3R3101T [mm]
  rect 1x1.6 smd: 1(-1,0) 2(1,0)
  silkscreen extent -2.1,-0.1 -1.9,0.1, body extent -1,-0.8 1,0.8, height 1
CAPC2013X135X45NL10T25 [mm] "Chip Capacitor, 2-Leads, Body 2.10x1.35mm, IPC Medium Density"
  rect 1.2x1.4 smd: 1(-0.85,0) 2(0.85,0)
  body extent -1.05,-0.67 1.05,0.67, height 1.35
CAPC2013X145X50LL20T25 [mm] "Chip Capacitor, 2-Leads, Body 2.00x1.25mm, IPC High Density"
  rect 1.1x1.35 smd: 1(-0.7,0) 2(0.7,0)
  body extent -1.1,-0.72 1.1,0.72, height 1.45
CAPC2013X145X50ML20T25 [mm] "Chip Capacitor, 2-Leads, Body 2.00x1.25mm, IPC Low Density"
  rect 1.5x1.55 smd: 1(-0.9,0) 2(0.9,0)
  body extent -1.1,-0.72 1.1,0.72, height 1.45
D0014A_N [mm] "SOIC, 14-Leads, Body 8.75x4mm, Pitch 1.27mm, IPC Medium Density"
  rrect17% 1.45x0.6 smd: 1(-2.725,3.81) 2(-2.725,2.54) 3(-2.725,1.27) 4(-2.725,0) 5(-2.725,-1.27) 6(-2.725,-2.54) 7(-2.725,-3.81) 8(2.725,-3.81) 9(2.725,-2.54) 10(2.725,-1.27) 11(2.725,0) 12(2.725,1.27) 13(2.725,2.54) 14(2.725,3.81)
  silkscreen extent -2.85,-4.38 1.6,4.78, body extent -3.02,-4.32 3.02,4.32, height 1.59
DDC0006A_N [mm]
  rect 1x0.6 smd paste+0 mask+0.051: 1(-1.375,0.95) 2(-1.375,0) 3(-1.375,-0.95) 4(1.375,-0.95) 5(1.375,0) 6(1.375,0.95)
  silkscreen extent -1.75,-1.52 0.7,1.53
ESWI-EG1218_V [mm] "THD, 3-Leads, Body 11.6x4mm, Pitch 2.5mm"
  rect 1.5x1.5 hole 1: 1(-2.5,0)
  round 1.5 hole 1: 2(0,0) 3(2.5,0)
  silkscreen extent -5.8,-2 5.8,2.77, body extent -5.8,-2 5.8,2, height 7.4
FP-318-08-IPC_A [mm]
  rect 1.824x0.618 smd paste+0 mask+0: 1(-0.96,0.95)
  rrect100% 1.824x0.618 smd paste+0 mask+0: 2(-0.96,-0.95) 3(0.96,0)
  silkscreen extent -0.65,-1.45 0.65,1.45, body extent -2.37,-1.95 2.37,1.95, height 0.25
FP-318-08-IPC_B [mm]
  rect 1.524x0.578 smd paste+0 mask+0: 1(-0.91,0.95)
  rrect100% 1.524x0.578 smd paste+0 mask+0: 2(-0.91,-0.95) 3(0.91,0)
  silkscreen extent -0.65,-1.45 0.65,1.45, body extent -1.92,-1.7 1.92,1.7, height 0.25
FP-2171790001-MFG [mm]
  rect 0.6x1.15 smd paste+0 mask+0: A1B12(-3.2,3.425) A4B9(-2.4,3.425) B1A12(3.2,3.425) B4A9(2.4,3.425)
  rect 0.3x1.15 smd paste+0 mask+0: A5(-1.25,3.425) A6(-0.25,3.425) A7(0.25,3.425) A8(1.25,3.425) B5(1.75,3.425) B6(0.75,3.425) B7(-0.75,3.425) B8(-1.75,3.425)
  rrect100% 1x1.8 hole 1.4 slot 0.6 at 0 deg paste-2539.97 mask+0: S1(-4.32,2.85) S2(4.32,2.85)
  rrect100% 1x2.2 hole 1.8 slot 0.6 at 0 deg paste-2539.97 mask+0: S3(-4.32,-1.15) S4(4.32,-1.15)
  silkscreen extent -4.57,-3.35 4.57,1.58, body extent -4.92,-3.45 4.92,4.1, height 0.25
FP-B3U-1100PM-MFG [mm]
  rect 0.8x1.7 smd paste+0 mask+0: 1(1.7,0) 2(-1.7,0)
  rect 0.8x1.1 smd paste+0 mask+0: 3(0,-1.65)
  silkscreen extent -1.6,-1.35 1.6,1.35, body extent -2.2,-2.3 2.2,1.45, height 0.25
FP-C04-056-IPC_A [mil]
  rect 77.38x24.64 smd paste+0 mask+0: 1(-143.32,75)
  rrect100% 77.38x24.64 smd paste+0 mask+0: 2(-143.32,25) 3(-143.32,-25) 4(-143.32,-75) 5(143.32,-75) 6(143.32,-25) 7(143.32,25) 8(143.32,75)
  silkscreen extent -209,-104 85,104, body extent -202,-123 202,123, height 10
FP-CC0603-DA-MFG [mm]
  rect 0.8x0.9 smd paste+0 mask+0: 1(-0.75,0) 2(0.75,0)
  silkscreen extent -0.85,-0.85 0.85,0.85, body extent -1.35,-0.75 1.35,0.75, height 0.25
FP-CL386-IPC_C [mil]
  rect 20.29x18.6 smd paste+0 mask+0: 1(-14.9,0) 2(14.9,0)
  silkscreen extent -25,-27 25,27, body extent -29,-15 29,15, height 10
FP-CRCW0603-e3-IPC_C [mil]
  rect 28.94x33.94 smd paste+0 mask+0: 1(-24.23,0) 2(24.23,0)
  silkscreen extent -30,-33 30,33, body extent -43,-23 43,23, height 10
FP-CRGCQ0402-IPC_C [mil]
  rect 22.03x18.6 smd paste+0 mask+0: 1(-14.81,0) 2(14.81,0)
  silkscreen extent -26,-27 26,27, body extent -30,-15 30,15, height 10
FP-LSM0603453V-MFG [mm]
  rect 0.7x0.7 smd paste+0 mask+0: 1(-0.7,0) 2(0.7,0)
  silkscreen extent -1.73,-0.72 0.85,0.72, body extent -1.15,-0.55 1.15,0.55, height 0.25
FP-M50-3610742-MFG [mm]
  rect 0.8x2.62 smd paste+0 mask+0: 1(-3.81,-1.94) 2(-3.81,1.94) 3(-2.54,-1.94) 4(-2.54,1.94) 5(-1.27,-1.94) 6(-1.27,1.94) 7(0,-1.94) 8(0,1.94) 9(1.27,-1.94) 10(1.27,1.94) 11(2.54,-1.94) 12(2.54,1.94) 13(3.81,-1.94) 14(3.81,1.94)
  round 0.95 hole 0.95 unplated paste-2539.97 mask+0: ""(-3.175,0) ""(3.175,0)
  silkscreen extent -4.69,-3.93 4.69,1.8, body extent -4.79,-3.35 4.79,3.35, height 0.25
FP-MCS0402-IPC_C [mil]
  rect 18.32x18.6 smd paste+0 mask+0: 1(-15.89,0) 2(15.89,0)
  silkscreen extent -25,-27 25,27, body extent -29,-15 29,15, height 10
FP-MCS0402-MFG [mm]
  rect 0.55x0.55 smd paste+0 mask+0: 1(-0.45,0) 2(0.45,0)
  silkscreen extent -0.53,-0.65 0.53,0.65, body extent -0.82,-0.38 0.82,0.38, height 0.25
FP-NR5040-H_4_1-MFG [mm]
  rect 1.5x4 smd paste+0 mask+0: 1(-1.8,0) 2(1.8,0)
  silkscreen extent -2.55,-2.55 2.55,2.55, body extent -2.65,-2.65 2.65,2.65, height 0.25
FP-RMCF0402-IPC_A [mil]
  rect 30.75x26.48 smd paste+0 mask+0: 1(-18.33,0) 2(18.33,0)
  silkscreen extent -34,-29 34,29, body extent -42,-21 42,21, height 10
FP-RMCF0402-IPC_B [mil]
  rect 26.81x22.54 smd paste+0 mask+0: 1(-16.36,0) 2(16.36,0)
  silkscreen extent -30,-27 30,27, body extent -36,-17 36,17, height 10
FP-RN73R1E-IPC_C [mil]
  rect 19.2x18.6 smd paste+0 mask+0: 1(-16.3,0) 2(16.3,0)
  silkscreen extent -26,-27 26,27, body extent -30,-15 30,15, height 10
FP-RT0402-MFG [mm]
  rect 0.5x0.6 smd paste+0 mask+0: 1(-0.5,0) 2(0.5,0)
  silkscreen extent -0.5,-0.71 0.5,0.7, body extent -0.85,-0.4 0.85,0.4, height 0.25
FP-S3B-XH-SM4-TB_LF_SN-MFG [mm]
  rect 1.3x4.5 smd paste+0 mask+0: 1(-2.5,4.65) 2(0,4.65) 3(2.5,4.65)
  rect 1.8x3.9 smd paste+0 mask+0: 4(-5.7,-2.15) 5(5.7,-2.15)
  silkscreen extent -6.25,-3.9 6.25,8, body extent -6.7,-4.2 6.7,7, height 0.25
FP-SiT8008-2-MFG [mm]
  rect 1.4x1.2 smd paste+0 mask+0: 1(-1.1,-0.95) 2(1.1,-0.95) 3(1.1,0.95) 4(-1.1,0.95)
  silkscreen extent -1.5,-2.75 1.5,1.95, body extent -1.9,-1.65 1.9,1.65, height 0.25
FP-SM02B-GHS-TB_LF_SN-MFG [mm]
  rect 0.6x1.7 smd paste+0 mask+0: 1(-0.625,2.275) 2(0.625,2.275)
  rect 1x2.7 smd paste+0 mask+0: 3(-2.475,-0.925) 4(2.475,-0.925)
  silkscreen extent -2.88,-2.02 2.88,3.82, body extent -3.08,-2.37 3.08,3.22, height 0.25
FP-SOT23-MFG [mm]
  rect 0.8x0.8 smd paste+0 mask+0: 1(-1.2,0.95) 2(-1.2,-0.95) 3(1.2,0)
  silkscreen extent -0.9,-1.55 0.9,1.55, body extent -1.7,-1.78 1.7,1.78, height 0.25
H3LIS100DLTR [mm]
  rect 0.55x0.3 smd: 1(-1.2,1) 2(-1.2,0.5) 3(-1.2,0) 4(-1.2,-0.5) 5(-1.2,-1) 9(1.2,-1) 10(1.2,-0.5) 11(1.2,0) 12(1.2,0.5) 13(1.2,1)
  rect 0.3x0.55 smd: 6(-0.5,-1.2) 7(0,-1.2) 8(0.5,-1.2) 14(0.5,1.2) 15(0,1.2) 16(-0.5,1.2)
  silkscreen extent -1.5,-1.5 1.5,1.5, body extent -1.5,-1.5 1.5,1.5, height 1
INF-PG-TSDSON-8_FL_V [mm] "TSDSON, 8-Leads, Body 3.3x3.3mm, Pitch 0.65mm"
  rect 0.34x1 smd mask+0.102: 1(-0.975,-1.5) 2(-0.325,-1.5) 4(0.975,-1.5)
  rect 0.34x1 smd: 3(0.325,-1.5)
  rect 0.34x0.8 smd mask+0.102: 5(0.975,1.5) 6(0.325,1.5) 7(-0.325,1.5) 8(-0.975,1.5)
  rect 1.64x0.5 smd mask+0.102: ""(-0.325,-1.25)
  rect 2.29x1.71 smd mask+0.102: ""(0,0.245)
  silkscreen extent -1.65,-2.67 1.65,1.65, body extent -1.65,-1.65 1.65,1.65, height 1.1
JST-SM08B-SRSS-TB_V [mm] "SMD, 8-Leads, Body 10x4.25mm, Pitch 1mm"
  rect 0.6x1.55 smd: 1(-3.5,2.45) 2(-2.5,2.45) 3(-1.5,2.45) 4(-0.5,2.45) 5(0.5,2.45) 6(1.5,2.45) 7(2.5,2.45) 8(3.5,2.45)
  rect 1.2x1.8 smd: MP1(-4.8,-1.425) MP2(4.8,-1.425)
  silkscreen extent -5,-2.12 5,3.9, body extent -5,-2.12 5,2.83, height 2.96
LSM6DS3USTR [mm]
  rect 0.475x0.25 smd: 1(-1.163,0.75) 2(-1.163,0.25) 3(-1.163,-0.25) 4(-1.163,-0.75) 8(1.163,-0.75) 9(1.163,-0.25) 10(1.163,0.25) 11(1.163,0.75)
  rect 0.25x0.475 smd: 5(-0.5,-0.912) 6(0,-0.912) 7(0.5,-0.912) 12(0.5,0.912) 13(0,0.912) 14(-0.5,0.912)
  silkscreen extent -2.3,0.65 -2.1,0.85, body extent -1.5,-1.25 1.5,1.25, height 0.86
MMC5983MA_MEM [mil]
  rect 18x12 smd paste+0 mask+0: 1(-50.2,29.53) 2(-50.2,9.84) 3(-50.2,-9.84) 4(-50.2,-29.53) 9(50.2,-29.53) 10(50.2,-9.84) 11(50.2,9.84) 12(50.2,29.53)
  rect 12x18 smd paste+0 mask+0: 5(-29.53,-50.2) 6(-9.84,-50.2) 7(9.84,-50.2) 8(29.53,-50.2) 13(29.53,50.2) 14(9.84,50.2) 15(-9.84,50.2) 16(-29.53,50.2)
  body extent -61,-61 61,61, height 39
"Mounting Hole"#1 [mm]
  round 4 hole 2.1: 1(-0.127,0.508)
"Mounting Hole"#2 [mm]
  round 4 hole 2.1: 1(0,0)
"Mounting Hole"#3 [mm]
  round 4 hole 2.1: 1(-1.524,0.635)
"Mounting Hole"#4 [mm]
  round 4 hole 2.1: 1(-1.651,-0.762)
MS5607-02BA03 [mm]
  rect 1.1x0.6 smd: 1(-1.1,1.875) 2(-1.1,0.625) 3(-1.1,-0.625) 4(-1.1,-1.875) 5(1.1,-1.875) 6(1.1,-0.625) 7(1.1,0.625) 8(1.1,1.875)
  silkscreen extent -2.51,-2.54 1.52,2.89, body extent -1.5,-2.4 1.5,2.6, height 0.95
ONSC-SOD-523-2-502-01_V [mm] "SOD, 2-Leads, Body 1.2x0.8mm"
  rect 0.48x0.4 smd: 1(-0.66,0) 2(0.66,0)
  silkscreen extent -0.75,-0.4 0.07,0.65, body extent -0.6,-0.4 0.6,0.4, height 0.7
QFP50P2200X2200X160-144N [mm]
  rect 1.475x0.3 smd: 1(-10.738,8.75) 2(-10.738,8.25) 3(-10.738,7.75) 4(-10.738,7.25) 5(-10.738,6.75) 6(-10.738,6.25) 7(-10.738,5.75) 8(-10.738,5.25) 9(-10.738,4.75) 10(-10.738,4.25) 11(-10.738,3.75) 12(-10.738,3.25) 13(-10.738,2.75) 14(-10.738,2.25) 15(-10.738,1.75) 16(-10.738,1.25) 17(-10.738,0.75) 18(-10.738,0.25) 19(-10.738,-0.25) 20(-10.738,-0.75) 21(-10.738,-1.25) 22(-10.738,-1.75) 23(-10.738,-2.25) 24(-10.738,-2.75) 25(-10.738,-3.25) 26(-10.738,-3.75) 27(-10.738,-4.25) 28(-10.738,-4.75) 29(-10.738,-5.25) 30(-10.738,-5.75) 31(-10.738,-6.25) 32(-10.738,-6.75) 33(-10.738,-7.25) 34(-10.738,-7.75) 35(-10.738,-8.25) 36(-10.738,-8.75) 73(10.738,-8.75) 74(10.738,-8.25) 75(10.738,-7.75) 76(10.738,-7.25) 77(10.738,-6.75) 78(10.738,-6.25) 79(10.738,-5.75) 80(10.738,-5.25) 81(10.738,-4.75) 82(10.738,-4.25) 83(10.738,-3.75) 84(10.738,-3.25) 85(10.738,-2.75) 86(10.738,-2.25) 87(10.738,-1.75) 88(10.738,-1.25) 89(10.738,-0.75) 90(10.738,-0.25) 91(10.738,0.25) 92(10.738,0.75) 93(10.738,1.25) 94(10.738,1.75) 95(10.738,2.25) 96(10.738,2.75) 97(10.738,3.25) 98(10.738,3.75) 99(10.738,4.25) 100(10.738,4.75) 101(10.738,5.25) 102(10.738,5.75) 103(10.738,6.25) 104(10.738,6.75) 105(10.738,7.25) 106(10.738,7.75) 107(10.738,8.25) 108(10.738,8.75)
  rect 0.3x1.475 smd: 37(-8.75,-10.738) 38(-8.25,-10.738) 39(-7.75,-10.738) 40(-7.25,-10.738) 41(-6.75,-10.738) 42(-6.25,-10.738) 43(-5.75,-10.738) 44(-5.25,-10.738) 45(-4.75,-10.738) 46(-4.25,-10.738) 47(-3.75,-10.738) 48(-3.25,-10.738) 49(-2.75,-10.738) 50(-2.25,-10.738) 51(-1.75,-10.738) 52(-1.25,-10.738) 53(-0.75,-10.738) 54(-0.25,-10.738) 55(0.25,-10.738) 56(0.75,-10.738) 57(1.25,-10.738) 58(1.75,-10.738) 59(2.25,-10.738) 60(2.75,-10.738) 61(3.25,-10.738) 62(3.75,-10.738) 63(4.25,-10.738) 64(4.75,-10.738) 65(5.25,-10.738) 66(5.75,-10.738) 67(6.25,-10.738) 68(6.75,-10.738) 69(7.25,-10.738) 70(7.75,-10.738) 71(8.25,-10.738) 72(8.75,-10.738) 109(8.75,10.738) 110(8.25,10.738) 111(7.75,10.738) 112(7.25,10.738) 113(6.75,10.738) 114(6.25,10.738) 115(5.75,10.738) 116(5.25,10.738) 117(4.75,10.738) 118(4.25,10.738) 119(3.75,10.738) 120(3.25,10.738) 121(2.75,10.738) 122(2.25,10.738) 123(1.75,10.738) 124(1.25,10.738) 125(0.75,10.738) 126(0.25,10.738) 127(-0.25,10.738) 128(-0.75,10.738) 129(-1.25,10.738) 130(-1.75,10.738) 131(-2.25,10.738) 132(-2.75,10.738) 133(-3.25,10.738) 134(-3.75,10.738) 135(-4.25,10.738) 136(-4.75,10.738) 137(-5.25,10.738) 138(-5.75,10.738) 139(-6.25,10.738) 140(-6.75,10.738) 141(-7.25,10.738) 142(-7.75,10.738) 143(-8.25,10.738) 144(-8.75,10.738)
  silkscreen extent -11.35,-9.65 9.65,9.65, body extent -11,-11 11,11, height 1.61
RESC0402(1005)_L [mm] "Chip Resistor, Body 1.0x0.5mm, IPC High Density"
  rrect25% 0.5x0.55 smd: 1(-0.45,0) 2(0.45,0)
  silkscreen extent 0,-0.2 0,0.2, body extent -0.5,-0.25 0.5,0.25, height 0.3
RESC1005X35X20LL05T10 [mm] "Chip Resistor, 2-Leads, Body 1.00x0.50mm, IPC High Density"
  rect 0.45x0.45 smd: 1(-0.4,0) 2(0.4,0)
  body extent -0.53,-0.27 0.53,0.28, height 0.35
RESC1005X40X25ML05T10 [mm] "Chip Resistor, 2-Leads, Body 1.00x0.50mm, IPC Low Density"
  rect 0.7x0.65 smd: 1(-0.475,0) 2(0.475,0)
  body extent -0.53,-0.27 0.53,0.28, height 0.4
RESC1005X40X25NL05T10 [mm] "Chip Resistor, 2-Leads, Body 1.00x0.50mm, IPC Medium Density"
  rect 0.6x0.55 smd: 1(-0.425,0) 2(0.425,0)
  body extent -0.53,-0.27 0.53,0.28, height 0.4
RESC1005X40X25NL10T10 [mm] "Chip Resistor, 2-Leads, Body 1.00x0.50mm, IPC Medium Density"
  rect 0.65x0.6 smd: 1(-0.425,0) 2(0.425,0)
  body extent -0.55,-0.3 0.55,0.3, height 0.4
RPW0010A-MFG [mm]
  round 0.27 smd paste-0.122 mask+0: 1(-0.75,0.7) 10(0.75,0.7)
  rect 0.6x0.25 smd paste+0 mask+0: 2(-0.9,0.225) 3(-0.9,-0.225) 8(0.9,-0.225) 9(0.9,0.225)
  round 0.255 smd paste-0.115 mask+0: 4(-0.75,-0.75) 7(0.75,-0.75)
  rect 0.3x2.4 smd paste-1.187 mask+0: 5(-0.25,0) 6(0.25,0)
  Top Layer region: -1.15,0.85 -0.85,0.85 -0.85,1.15 -0.8,1.2 -0.65,1.2 -0.6,1.15 -0.6,0.6 -0.65,0.55 -1.15,0.55 -1.2,0.6 -1.2,0.8
  Top Layer region: -1.15,-0.85 -0.85,-0.85 -0.85,-1.15 -0.8,-1.2 -0.65,-1.2 -0.6,-1.15 -0.6,-0.6 -0.65,-0.55 -1.15,-0.55 -1.2,-0.6 -1.2,-0.8
  Top Layer region: 1.15,-0.85 0.85,-0.85 0.85,-1.15 0.8,-1.2 0.65,-1.2 0.6,-1.15 0.6,-0.6 0.65,-0.55 1.15,-0.55 1.2,-0.6 1.2,-0.8
  Top Layer region: 1.15,0.85 0.85,0.85 0.85,1.15 0.8,1.2 0.65,1.2 0.6,1.15 0.6,0.6 0.65,0.55 1.15,0.55 1.2,0.6 1.2,0.8
  silkscreen extent -1.62,-1.58 1.05,1.58
RYT0009A-MFG [mm]
  rect 0.875x0.25 smd paste+0 mask+0: 1(-0.763,0.25) 2(-0.763,-0.25) 5(0.763,-0.25) 6(0.763,0.25)
  round 0.242 smd paste+0 mask+0: 3(-0.509,-0.828) 7(0.537,0.787) 9(-0.509,0.828)
  round 0.278 smd paste+0 mask+0: 4(0.487,-0.787)
  rect 0.25x0.65 smd paste+0 mask+0: 8(0,0.95)
  Top Layer region: -1.2,-0.675 -1.2,-0.825 -1.15,-0.875 -0.675,-0.875 -0.625,-0.925 -0.625,-1.225 -0.575,-1.275 -0.425,-1.275 -0.375,-1.225 -0.375,-0.912 -0.35,-0.868 -0.325,-0.825 -0.325,-0.675 -0.375,-0.625 -1.15,-0.625
  Top Layer region: 1.2,-0.675 1.2,-0.825 1.15,-0.875 0.675,-0.875 0.625,-0.925 0.625,-1.225 0.575,-1.275 0.425,-1.275 0.375,-1.225 0.375,-0.912 0.35,-0.868 0.325,-0.825 0.325,-0.675 0.375,-0.625 1.15,-0.625
  Top Layer region: -1.2,0.675 -1.2,0.825 -1.15,0.875 -0.675,0.875 -0.625,0.925 -0.625,1.225 -0.575,1.275 -0.425,1.275 -0.375,1.225 -0.375,0.675 -0.425,0.625 -1.15,0.625
  Top Layer region: 1.2,0.675 1.2,0.825 1.15,0.875 0.675,0.875 0.625,0.925 0.625,1.225 0.575,1.275 0.425,1.275 0.375,1.225 0.375,0.675 0.425,0.625 1.15,0.625
  silkscreen extent -1.73,-1.3 1.19,1.3, body extent -1,-1.1 1,1.1, height 1.05
SMTC-TSW-102-08-X-S-NA [mm] ".025 SQ Post Terminal Strip Assembly, 1x2 Pins, Right Angle, 2.54mm Pitch, Male"
  rect 1.55x1.55 hole 1.02: 1(0,0)
  round 1.55 hole 1.02: 2(2.54,0)
  silkscreen extent -1.46,1.52 4,4.06, body extent -1.27,-0.32 3.94,9.9, height 2.54
SOT95P280X145-6N [mm]
  rrect25% 1.21x0.58 smd paste+0 mask+0.102: 1(-1.255,0.95) 2(-1.255,0) 3(-1.255,-0.95) 4(1.255,-0.95) 5(1.255,0) 6(1.255,0.95)
  silkscreen extent -2.6,-1.56 0.8,1.56, body extent -1.4,-1.45 1.4,1.45, height 1.45
SOT-23-6_L2.9-W1.6-P0.95-LS2.8-BR [mil]
  rect 43.3x23.6 smd paste+0 mask+2: 1(53.2,-37.4) 2(53.2,0) 3(53.2,37.4) 4(-53.1,37.4) 5(-53.1,0) 6(-53.1,-37.4)
  silkscreen extent -35,-70 60,61
TECO-MS561101BA03_V [mm] "SMD, 8-Leads, Body 3x5mm, Pitch 1.25mm"
  rrect20% 1.1x0.6 smd: 1(-1.1,1.875) 2(-1.1,0.625) 3(-1.1,-0.625) 4(-1.1,-1.875) 5(1.1,-1.875) 6(1.1,-0.625) 7(1.1,0.625) 8(1.1,1.875)
  silkscreen extent -1.9,-2.7 1.9,2.7, body extent -1.5,-2.5 1.5,2.5, height 0.73
TPS22991BNRAAR-Footprint-1 [mm]
  rect 0.475x0.2 smd paste+0 mask+0: 1(-0.337,0.2) 2(-0.337,-0.2) 3(0.337,-0.2) 4(0.337,0.2)
  silkscreen extent -1.25,-0.67 0.4,0.67, body extent -0.38,-0.43 0.38,0.43, height 0.6
USBLC62P6 [mm]
  rect 0.3x0.99 smd: 1(-0.5,-0.805) 2(0,-0.805) 3(0.5,-0.805) 4(0.5,0.805) 5(0,0.805) 6(-0.5,0.805)
  silkscreen extent -0.94,-1.29 -0.84,-1.19, body extent -0.75,-0.75 0.75,0.75, height 0.46
VLGA4_AUA_MCH [mil]
  rect 28x28 smd paste+0 mask+0: 1(-24.5,32.48) 2(-24.5,-32.48) 3(24.5,-32.48) 4(24.5,32.48)
  silkscreen extent -68,-7 44,42, body extent -39,-49 39,49, height 35
VQFN-10_L2.0-W2.0-P0.45-TL [mil]
  round 2.4 smd: 1(-34,33) 4(-33.6,-33) 7(34,-33) 10(34,33)
  rect 23.6x9.8 smd paste+0 mask+2: 2(-35.6,8.9) 3(-35.6,-8.9) 8(35.6,-8.9) 9(35.6,8.9)
  rect 11.8x94.5 smd paste+0 mask+2: 5(-9.2,0) 6(10.4,0)
  Top Layer region: 34.1,47.2 34.1,35.4 47.9,35.4 47.9,23.6 34.1,23.6 24.2,23.6 24.2,23.6 24.2,35.4 24.2,35.4 24.2,47.2 34.1,47.2
  Top Layer region: 34.1,-47.2 34.1,-35.4 47.9,-35.4 47.9,-23.6 34.1,-23.6 24.2,-23.6 24.2,-23.6 24.2,-35.4 24.2,-35.4 24.2,-47.2 34.1,-47.2
  Top Layer region: -33.7,-47.2 -33.7,-35.4 -47.4,-35.4 -47.4,-23.6 -33.7,-23.6 -23.8,-23.6 -23.8,-23.6 -23.8,-35.4 -23.8,-35.4 -23.8,-47.2 -33.7,-47.2
  Top Layer region: -34,47.2 -34,35.4 -47.8,35.4 -47.8,23.6 -34,23.6 -24.2,23.6 -24.2,23.6 -24.2,35.4 -24.2,35.4 -24.2,47.2 -34,47.2
  silkscreen extent -73,-50 53,54
WCAP-AS5H_D10H10.5 [mm] "Aluminum Electrolytic Capacitors, 10x10.5mm"
  rect 4.4x1.9 smd: 1(4.35,0) 2(-4.35,0)
  silkscreen extent -5.25,-5.25 5.25,5.25, body extent -5.5,-5.15 5.5,5.15, height 10.5

## Part data
BT1: library part CMP-03913-94032819-2, "Battery Holder, 12VDC, 30 Mohm, 2032 Battery Type, Black, Tht Mount", Current Rating=500mA, Insulation Resistance=100MΩ, Max Operating Temperature=85°C, Min Operating Temperature=-25°C, RoHS=Compliant
C1 C3 C6 C8 C12 C13: library part C_10uF_0402, "Ceramic Capacitor, Multilayer, Ceramic, 10V, 20% +Tol, 20% -Tol, X5R, +-15% TC, 10uF, Surface Mount, 0402 inch", Case Code (Imperial)=0402, Case Code (Metric)=1005, Dielectric=X5R, Dielectric Material=Ceramic, LCSC Part #=C315248, Manufacturer="Samsung Electro-Mechanics", Manufacturer Part Number=CL05A106MP5NUNC, Max Operating Temperature=85°C, Min Operating Temperature=-55°C, Supplier Part Number=1276-1450-1-ND, Tolerance=20%, Voltage Rating=10V, Case/Package=0402, Category="Ceramic Capacitors", China RoHS=Compliant, ComponentLink1Description=https://datasheet.octopart.com:443/CL05A106MP5NUNC-Samsung-Electro-Mechanics-datasheet-182018593.pdf?src-supplier=IHS, ComponentLink1URL=https://datasheet.octopart.com:443/CL05A106MP5NUNC-Samsung-Electro-Mechanics-datasheet-182018593.pdf?src-supplier=IHS, ComponentLink2Description=https://datasheet.octopart.com:443/CL05A106MP5NUNC-Samsung-Electro-Mechanics-datasheet-136031723.pdf?src-supplier=Upverter, ComponentLink2URL=https://datasheet.octopart.com:443/CL05A106MP5NUNC-Samsung-Electro-Mechanics-datasheet-136031723.pdf?src-supplier=Upverter, ComponentLink3Description=https://datasheet.octopart.com:443/CL05A106MP5NUNC-Samsung-Electro-Mechanics-datasheet-110226206.pdf?src-supplier=Future+Electronics, ComponentLink3URL=https://datasheet.octopart.com:443/CL05A106MP5NUNC-Samsung-Electro-Mechanics-datasheet-110226206.pdf?src-supplier=Future+Electronics, ComponentLink4Description=https://datasheet.octopart.com:443/CL05A106MP5NUNC-Samsung-Electro-Mechanics-datasheet-87580039.pdf?src-supplier=Future+Electronics, ComponentLink4URL=https://datasheet.octopart.com:443/CL05A106MP5NUNC-Samsung-Electro-Mechanics-datasheet-87580039.pdf?src-supplier=Future+Electronics, ComponentLink5Description=https://datasheet.octopart.com:443/CL05A106MP5NUNC-Samsung-Electro-Mechanics-datasheet-81461595.pdf?src-supplier=Future+Electronics, ComponentLink5URL=https://datasheet.octopart.com:443/CL05A106MP5NUNC-Samsung-Electro-Mechanics-datasheet-81461595.pdf?src-supplier=Future+Electronics, ComponentLink6Description=https://datasheet.octopart.com:443/CL05A106MP5NUNC-Samsung-datasheet-42280527.pdf?src-supplier=Future+Electronics, ComponentLink6URL=https://datasheet.octopart.com:443/CL05A106MP5NUNC-Samsung-datasheet-42280527.pdf?src-supplier=Future+Electronics, ComponentLink7Description=https://datasheet.octopart.com:443/CL05A106MP5NUNC-Samsung-datasheet-34153002.pdf?src-supplier=Future+Electronics, ComponentLink7URL=https://datasheet.octopart.com:443/CL05A106MP5NUNC-Samsung-datasheet-34153002.pdf?src-supplier=Future+Electronics, ComponentLink8Description=https://datasheet.octopart.com:443/CL05A106MP5NUNC-Samsung-datasheet-25077983.pdf?src-supplier=Future+Electronics, ComponentLink8URL=https://datasheet.octopart.com:443/CL05A106MP5NUNC-Samsung-datasheet-25077983.pdf?src-supplier=Future+Electronics, ComponentLink9Description=https://datasheet.octopart.com:443/CL05A106MP5NUNC-Samsung-Electro-Mechanics-datasheet-149136670.pdf?src-supplier=Future+Electronics, ComponentLink9URL=https://datasheet.octopart.com:443/CL05A106MP5NUNC-Samsung-Electro-Mechanics-datasheet-149136670.pdf?src-supplier=Future+Electronics, ComponentLink10Description=https://datasheet.octopart.com:443/CL05A106MP5NUNC-Samsung-datasheet-8326407.pdf?src-supplier=TME, ComponentLink10URL=https://datasheet.octopart.com:443/CL05A106MP5NUNC-Samsung-datasheet-8326407.pdf?src-supplier=TME, Contact Plating=Tin, Depth=500µm, Height=700µm, Lead Free="Lead Free", Length=1mm, Lifecycle Status=NRND, Material=Ceramic, Mounting Technology="Surface Mount", Number of Terminals=2, Packaging="Tape and Reel", Pricing="1=0.08, 10=0.038, 50=0.034, 100=0.0296, 500=0.0272, 1000=0.02, 2500=0.01844 (USD)", Radiation Hardening=No, REACH SVHC=Yes, RoHS=Compliant, Schedule B="8532240020, 8532240020|8532240020|8532240020|8532240020|8532240020|8532240020|8532240020|8532240020|8532240020|8532240020|8532240020|8532240020|8532240020|8532240020|8532240020|8532240020|8532240020|8532240020|8532240020|8532240020|8532240020|8532240020|8532240020|85", Stock=1973072, Supplier=DigiKey, Termination=Wraparound, Thickness=711.2µm, Voltage Rating (DC)=10V, Width=500µm
C2 C4 C5 C7 C9 C11 C14 C15 C17 C21 C29 C30 C31 C34 C35 C37 C38 C39 C40 C42 C43 C44 C45 C46 C47 C48 C49 C50 C51 C53 C54 C55 C56 C57 C58 C59 C60 C61 C64 C65 C66 C67: library part C_100nF_0402, "Ceramic Capacitor, Multilayer, Ceramic, 16V, 10% +Tol, 10% -Tol, X7R, +-15% TC, 100nF, Surface Mount, 0402 inch", Case Code (Imperial)=0402, Case Code (Metric)=1005, Dielectric=X7R, Dielectric Material=Ceramic, LCSC Part #=C1525, Manufacturer="Samsung Electro-Mechanics", Manufacturer Part Number=CL05B104KO5NNNC, Max Operating Temperature=125°C, Min Operating Temperature=-55°C, Supplier Part Number=1276-1001-1-ND, Tolerance=10%, Voltage=16V, Case/Package=0402, Category="Ceramic Capacitors", China RoHS=Compliant, ComponentLink1Description=https://datasheet.octopart.com:443/CL05B104KO5NNNC-Samsung-Electro-Mechanics-datasheet-181960518.pdf?src-supplier=IHS, ComponentLink1URL=https://datasheet.octopart.com:443/CL05B104KO5NNNC-Samsung-Electro-Mechanics-datasheet-181960518.pdf?src-supplier=IHS, ComponentLink2Description=https://datasheet.octopart.com:443/CL05B104KO5NNNC-Samsung-Electro-Mechanics-datasheet-81461623.pdf?src-supplier=Upverter, ComponentLink2URL=https://datasheet.octopart.com:443/CL05B104KO5NNNC-Samsung-Electro-Mechanics-datasheet-81461623.pdf?src-supplier=Upverter, ComponentLink3Description=https://datasheet.octopart.com/CL05B104KO5NNNC-Samsung-Electro-Mechanics-datasheet-8324245.pdf, ComponentLink3URL=https://datasheet.octopart.com/CL05B104KO5NNNC-Samsung-Electro-Mechanics-datasheet-8324245.pdf, ComponentLink4Description=https://datasheet.octopart.com/CL05B104KO5NNNC-Samsung-Electro-Mechanics-datasheet-97040617.pdf, ComponentLink4URL=https://datasheet.octopart.com/CL05B104KO5NNNC-Samsung-Electro-Mechanics-datasheet-97040617.pdf, ComponentLink5Description=https://datasheet.octopart.com/General-Multilayer-Ceramic-Capacitors-Samsung-datasheet-family-111.pdf, ComponentLink5URL=https://datasheet.octopart.com/General-Multilayer-Ceramic-Capacitors-Samsung-datasheet-family-111.pdf, ComponentLink6Description=https://datasheet.octopart.com:443/CL05B104KO5NNNC-Samsung-Electro-Mechanics-datasheet-141346863.pdf?src-supplier=Samsung+SCT, ComponentLink6URL=https://datasheet.octopart.com:443/CL05B104KO5NNNC-Samsung-Electro-Mechanics-datasheet-141346863.pdf?src-supplier=Samsung+SCT, ComponentLink7Description=https://datasheet.octopart.com:443/CL05B104KO5NNNC-Samsung-datasheet-151956582.pdf?src-supplier=SOS+electronic, ComponentLink7URL=https://datasheet.octopart.com:443/CL05B104KO5NNNC-Samsung-datasheet-151956582.pdf?src-supplier=SOS+electronic, ComponentLink8Description=https://datasheet.octopart.com:443/CL05B104KO5NNNC-Samsung-datasheet-42485123.pdf?src-supplier=Future+Electronics, ComponentLink8URL=https://datasheet.octopart.com:443/CL05B104KO5NNNC-Samsung-datasheet-42485123.pdf?src-supplier=Future+Electronics, ComponentLink9Description=https://datasheet.octopart.com:443/CL05B104KO5NNNC-Samsung-datasheet-34153835.pdf?src-supplier=Future+Electronics, ComponentLink9URL=https://datasheet.octopart.com:443/CL05B104KO5NNNC-Samsung-datasheet-34153835.pdf?src-supplier=Future+Electronics, ComponentLink10Description=https://datasheet.octopart.com:443/CL05B104KO5NNNC-Samsung-datasheet-26589024.pdf?src-supplier=Future+Electronics, ComponentLink10URL=https://datasheet.octopart.com:443/CL05B104KO5NNNC-Samsung-datasheet-26589024.pdf?src-supplier=Future+Electronics, ComponentLink11Description=https://datasheet.octopart.com:443/CL05B104KO5NNNC-Samsung-Electro-Mechanics-datasheet-149136714.pdf?src-supplier=Future+Electronics, ComponentLink11URL=https://datasheet.octopart.com:443/CL05B104KO5NNNC-Samsung-Electro-Mechanics-datasheet-149136714.pdf?src-supplier=Future+Electronics, ComponentLink12Description=https://datasheet.octopart.com:443/CL05B104KO5NNNC-Samsung-datasheet-59220082.pdf?src-supplier=TME, ComponentLink12URL=https://datasheet.octopart.com:443/CL05B104KO5NNNC-Samsung-datasheet-59220082.pdf?src-supplier=TME, ComponentLink13Description=http://sigma.octopart.com:80/rohs_certificate/General-Multilayer-Ceramic-Capacitors-Samsung-family-110.pdf?src-supplier=Compliance+Statements, ComponentLink13URL=http://sigma.octopart.com:80/rohs_certificate/General-Multilayer-Ceramic-Capacitors-Samsung-family-110.pdf?src-supplier=Compliance+Statements, ComponentLink14Description=http://sigma.octopart.com:80/rohs_statement/General-Multilayer-Ceramic-Capacitors-Samsung-family-132.pdf?src-supplier=Compliance+Statements, ComponentLink14URL=http://sigma.octopart.com:80/rohs_statement/General-Multilayer-Ceramic-Capacitors-Samsung-family-132.pdf?src-supplier=Compliance+Statements, ComponentLink15Description=http://sigma.octopart.com:80/reach_statement/General-Multilayer-Ceramic-Capacitors-Samsung-family-133.pdf?src-supplier=Compliance+Statements, ComponentLink15URL=http://sigma.octopart.com:80/reach_statement/General-Multilayer-Ceramic-Capacitors-Samsung-family-133.pdf?src-supplier=Compliance+Statements, Contact Plating=Tin, Depth=500µm, Height=500µm, Lead Free="Lead Free", Length=1mm, Lifecycle Status=Production, Material=Ceramic, Mounting Technology="Surface Mount", Number of Terminals=2, Pricing="1=0.08, 10=0.009, 50=0.0076, 100=0.0064, 500=0.0056, 1000=0.004, 2500=0.00394 (USD)", Radiation Hardening=No, REACH SVHC=Yes, RoHS=Compliant, Schedule B="8532240020, 8532240020|8532240020|8532240020|8532240020|8532240020|8532240020|8532240020|8532240020|8532240020|8532240020|8532240020|8532240020|8532240020|8532240020|8532240020|8532240020|8532240020|8532240020|8532240020|8532240020|8532240020|8532240020|8532240020|85", Stock=253470, Supplier=DigiKey, Thickness=558.8µm, Voltage Rating=16V, Voltage Rating (DC)=16V, Width=500µm
C10 C16 C36 C68 C71 C104: library part CMP-001-00091-2, "Ceramic Capacitor, Multilayer, Ceramic, 35V, 10% +Tol, 10% -Tol, X5R, 15% TC, 1uF, Surface Mount, 0402", Capacitor Type=Ceramic, Case/Package=0402, LCSC Part Number=C307413, Manufacturer=Samsung, Max Operating Temperature=85°C, Min Operating Temperature=-55°C, Package Height=0.32mm, Package Length=1mm, Package Shape=Rectangular, Package Style=SMTMeter, Package Width=0.5mm, Power=62.5mW, Rated DC Voltage (URdc)=35V, Rated Temperature=70°C, Resistor Type="FIXED RESISTOR", Temperature Characteristics Code=X5R, Temperature Coefficient=100ppm/°C, Tolerance=1%, Tolerance  (fill in as +-)=10%, Working Voltage=50V, Additional Feature="LASER TRIMMABLE", Category="Ceramic Capacitors", Component Type=Standard, ComponentLink1Description=https://datasheet.ciiva.com:443/pdfs/VipMasterIC/IC/SEMS/SEMS-S-A0008384515/SEMS-S-A0008872905-1.pdf?src-supplier=IHS+Markit, ComponentLink1URL=https://datasheet.ciiva.com:443/pdfs/VipMasterIC/IC/SEMS/SEMS-S-A0008384515/SEMS-S-A0008872905-1.pdf?src-supplier=IHS+Markit, ComponentLink2Description=http://www.samsungsem.com/kr/support/product-search/mlcc/CL05A105KL5NRNC.jsp?src-supplier=Digikey, ComponentLink2URL=http://www.samsungsem.com/kr/support/product-search/mlcc/CL05A105KL5NRNC.jsp?src-supplier=Digikey, ComponentLink3Description=https://datasheet.octopart.com/CL05A105KL5NRNC-Samsung-datasheet-8326407.pdf?src-supplier=TME, ComponentLink3URL=https://datasheet.octopart.com/CL05A105KL5NRNC-Samsung-datasheet-8326407.pdf?src-supplier=TME, ComponentLink4Description=https://datasheet.ciiva.com:443/pdfs/VipMasterIC/IC/YAGO/YAGO-S-A0003597364/YAGO-S-A0003597364-1.pdf?src-supplier=IHS+Markit, ComponentLink4URL=https://datasheet.ciiva.com:443/pdfs/VipMasterIC/IC/YAGO/YAGO-S-A0003597364/YAGO-S-A0003597364-1.pdf?src-supplier=IHS+Markit, ComponentLink5Description=https://datasheet.ciiva.com/12656/pyu-ac-51-rohs-l-2-12656634.pdf?src-supplier=Mouser, ComponentLink5URL=https://datasheet.ciiva.com/12656/pyu-ac-51-rohs-l-2-12656634.pdf?src-supplier=Mouser, Construction=Chip, Design Item ID=CL05A105KL5NRNC, Dielectric Material=Ceramic, JESD-609 Code=e3, Manufacturer Part Number=CL05A105KL5NRNC, Mounting Technology="Surface Mount", Multilayer=Yes, Packaging="Tape and Reel", Pins=2, Pricing="1=0.31, 10=0.181, 50=0.1296, 100=0.1136, 500=0.08658, 1000=0.07816, 2500=0.06921, 5000=0.06379, 10000=0.0593, 20000=0.05558, 30000=0.0537, 50000=0.05162, 70000=0.0504, 100000=0.04922 (USD)", Reach SVHC Compliant=Yes, Reference Standard=AEC-Q200, RoHS=Yes, RoHS Compliant=Yes, Source=Hybrids_Avionics.SCHLIB, Stock=299048, Technology="METAL GLAZE/THICK FILM", Terminal Finish=Nickel, Termination=Wraparound, Tolerance (fill in as +-)=10%
C18: library part CMP-2007-01044-1, "Ceramic Capacitor, Multilayer, Ceramic, 10V, 10% +Tol, 10% -Tol, X7R, 15% TC, 10uF, Surface Mount, 0805", Manufacturer=Kemet, Part Number=C0805C106K8RACTU
C19 C20 C25 C27 C28: library part CMP-2007-01044-1, "Ceramic Capacitor, Multilayer, Ceramic, 10V, 10% +Tol, 10% -Tol, X7R, 15% TC, 10uF, Surface Mount, 0805", Capacitance=10uF, Manufacturer=Kemet, Part Number=C0805C106K8RACTU
C22: library part CMP-001-00007-7, "Ceramic Capacitor, Multilayer, Ceramic, 10V, 10% +Tol, 10% -Tol, X7R, 15% TC, 10uF, Surface Mount, 0805", Capacitor Type=Ceramic, Case/Package=0805, Max Operating Temperature=125°C, Min Operating Temperature=-55°C, Tolerance=10%, Voltage Rating=50V, Mounting Technology=SM, Pins=2, RoHS Compliant=True